# Altium PCB PCB.PcbDoc (part 1 of 8)
Units mm, origin at the board's own origin, x right, y up, seen from the top; angles counter-clockwise.
Board outline 78.8 x 69 mm, 12 copper layers (Top Layer, GND_12, uStrip1, GND_35, Clocks, GND_57, POWER, Slow_Ctrl, GND_810, uStrip2, GND_1012, Bottom Layer), stack 2.926 mm thick; 460 components, 314 nets, 1929 pads, 3409 vias.
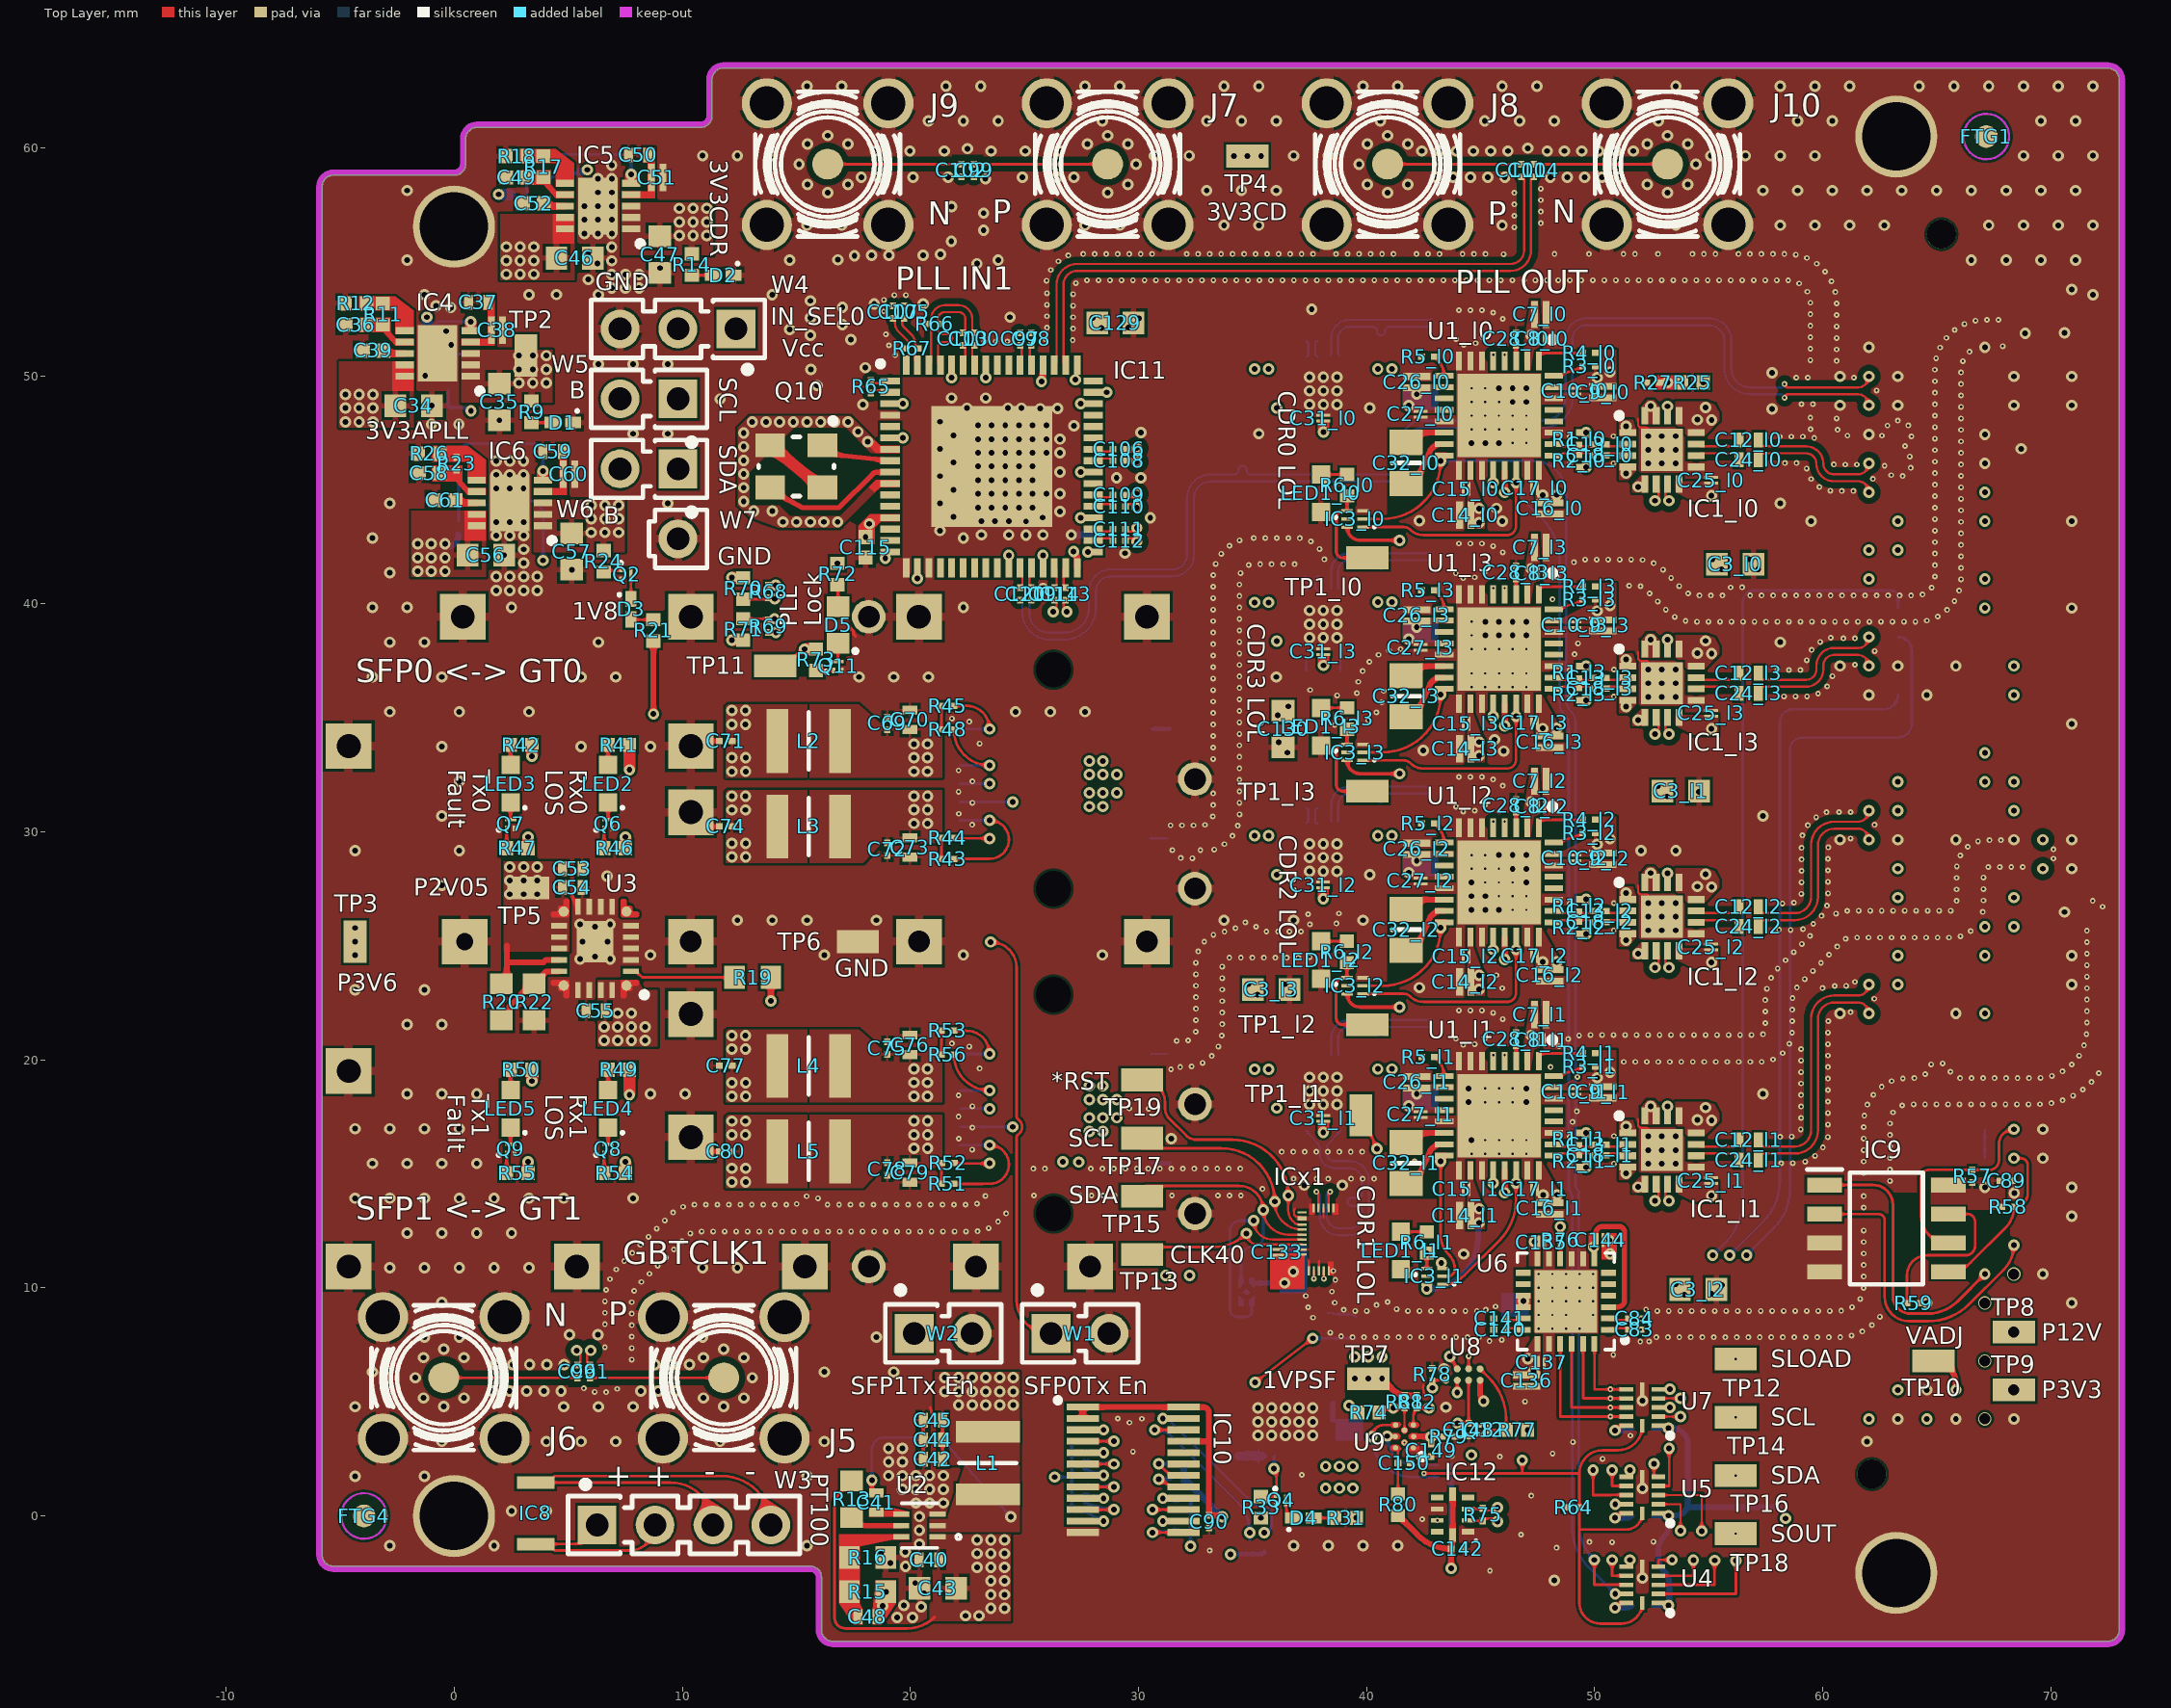
[diagram p0: Top Layer view]
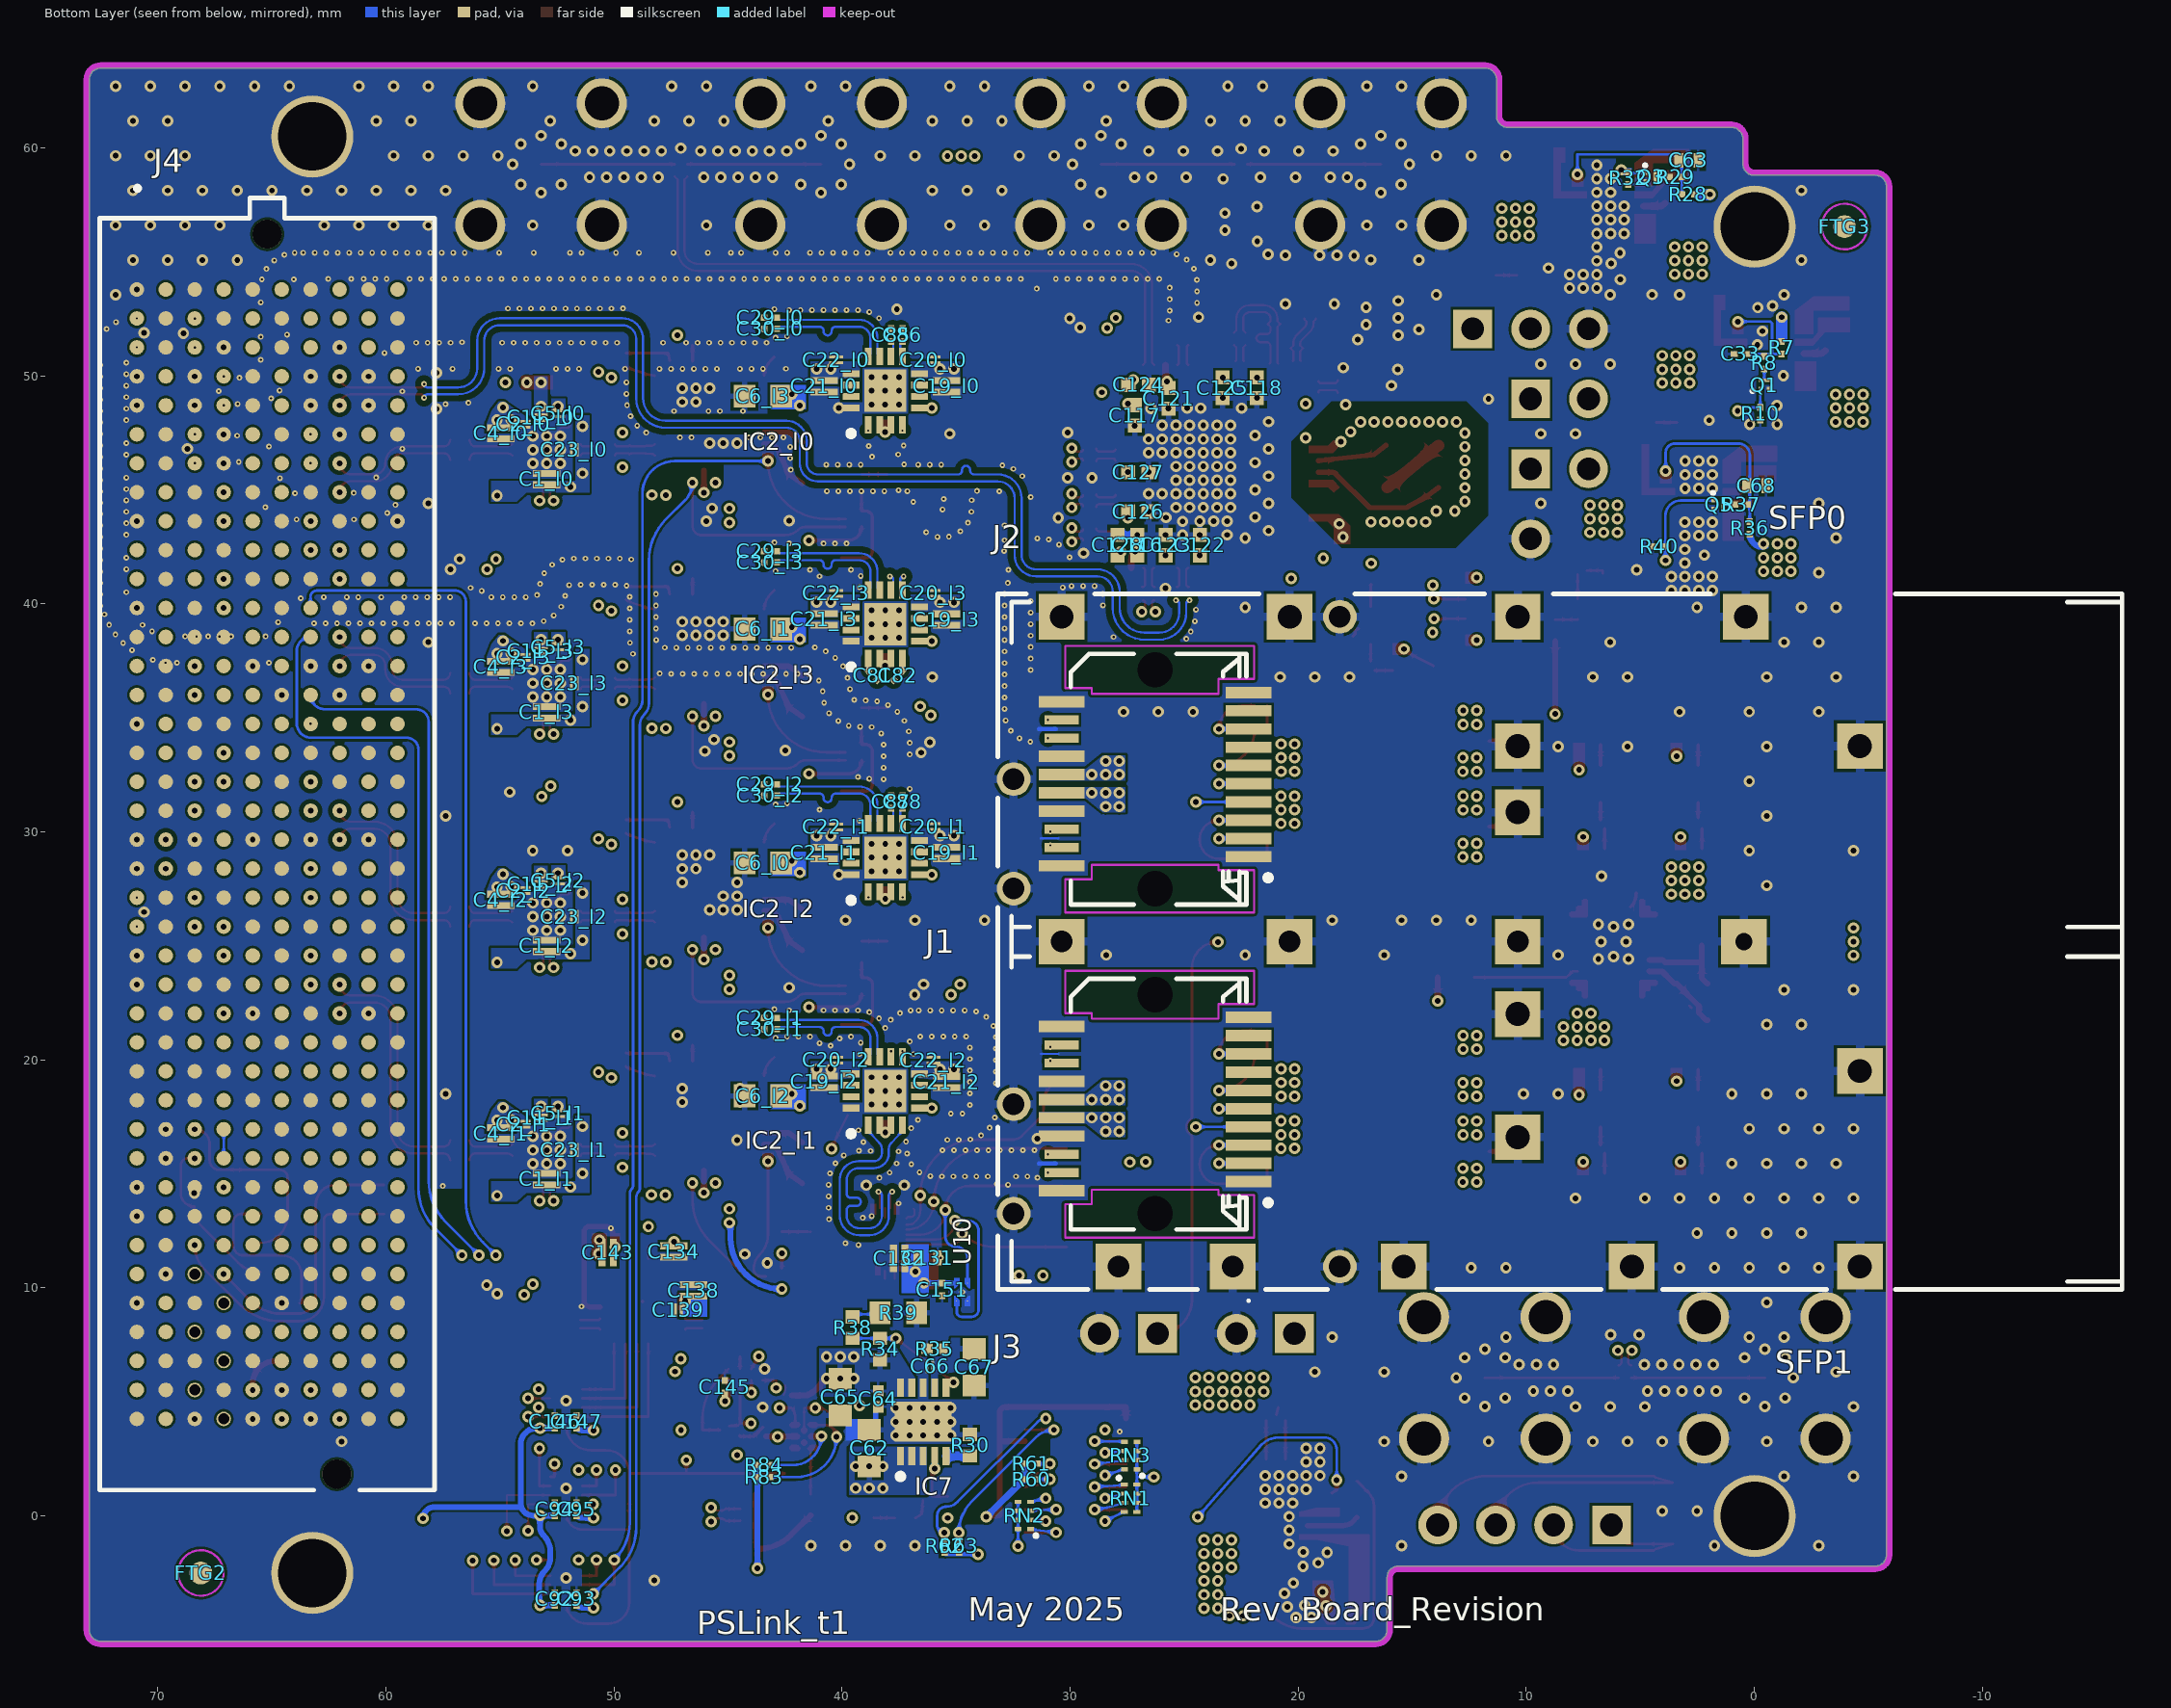
[diagram p1: Bottom Layer view, seen from below]
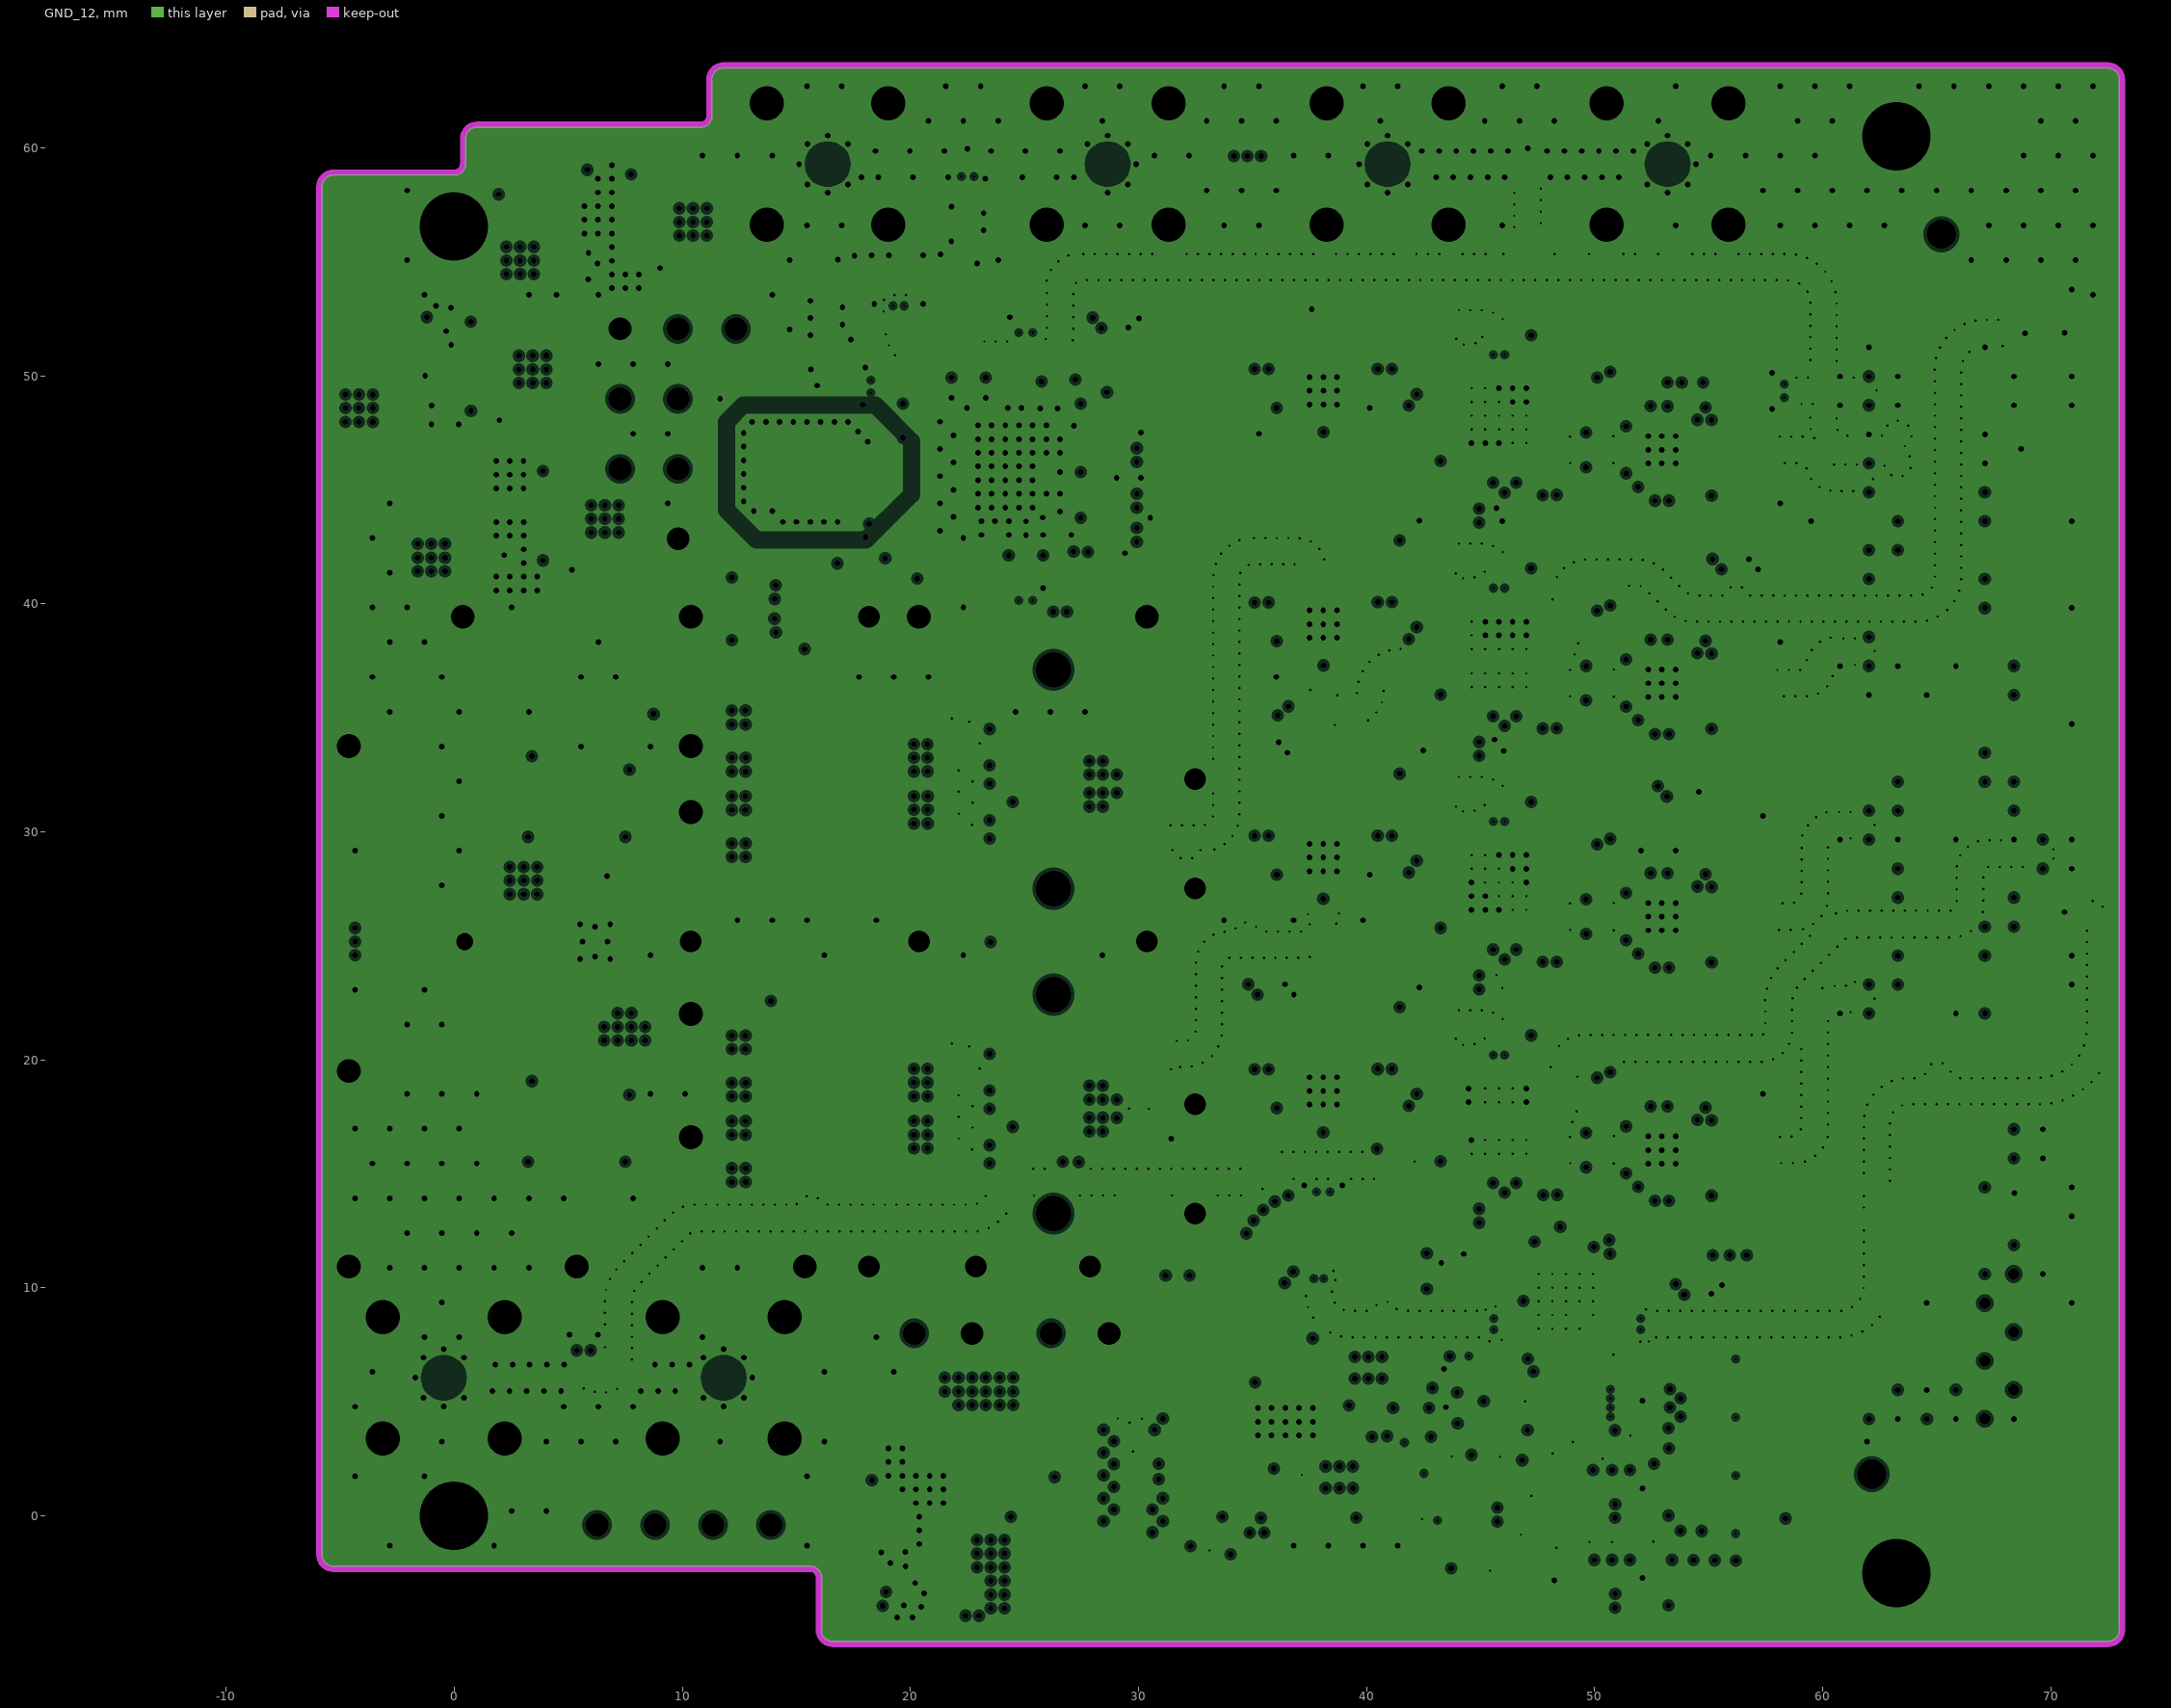
[diagram p2: GND_12, clearances drawn from the general rule]
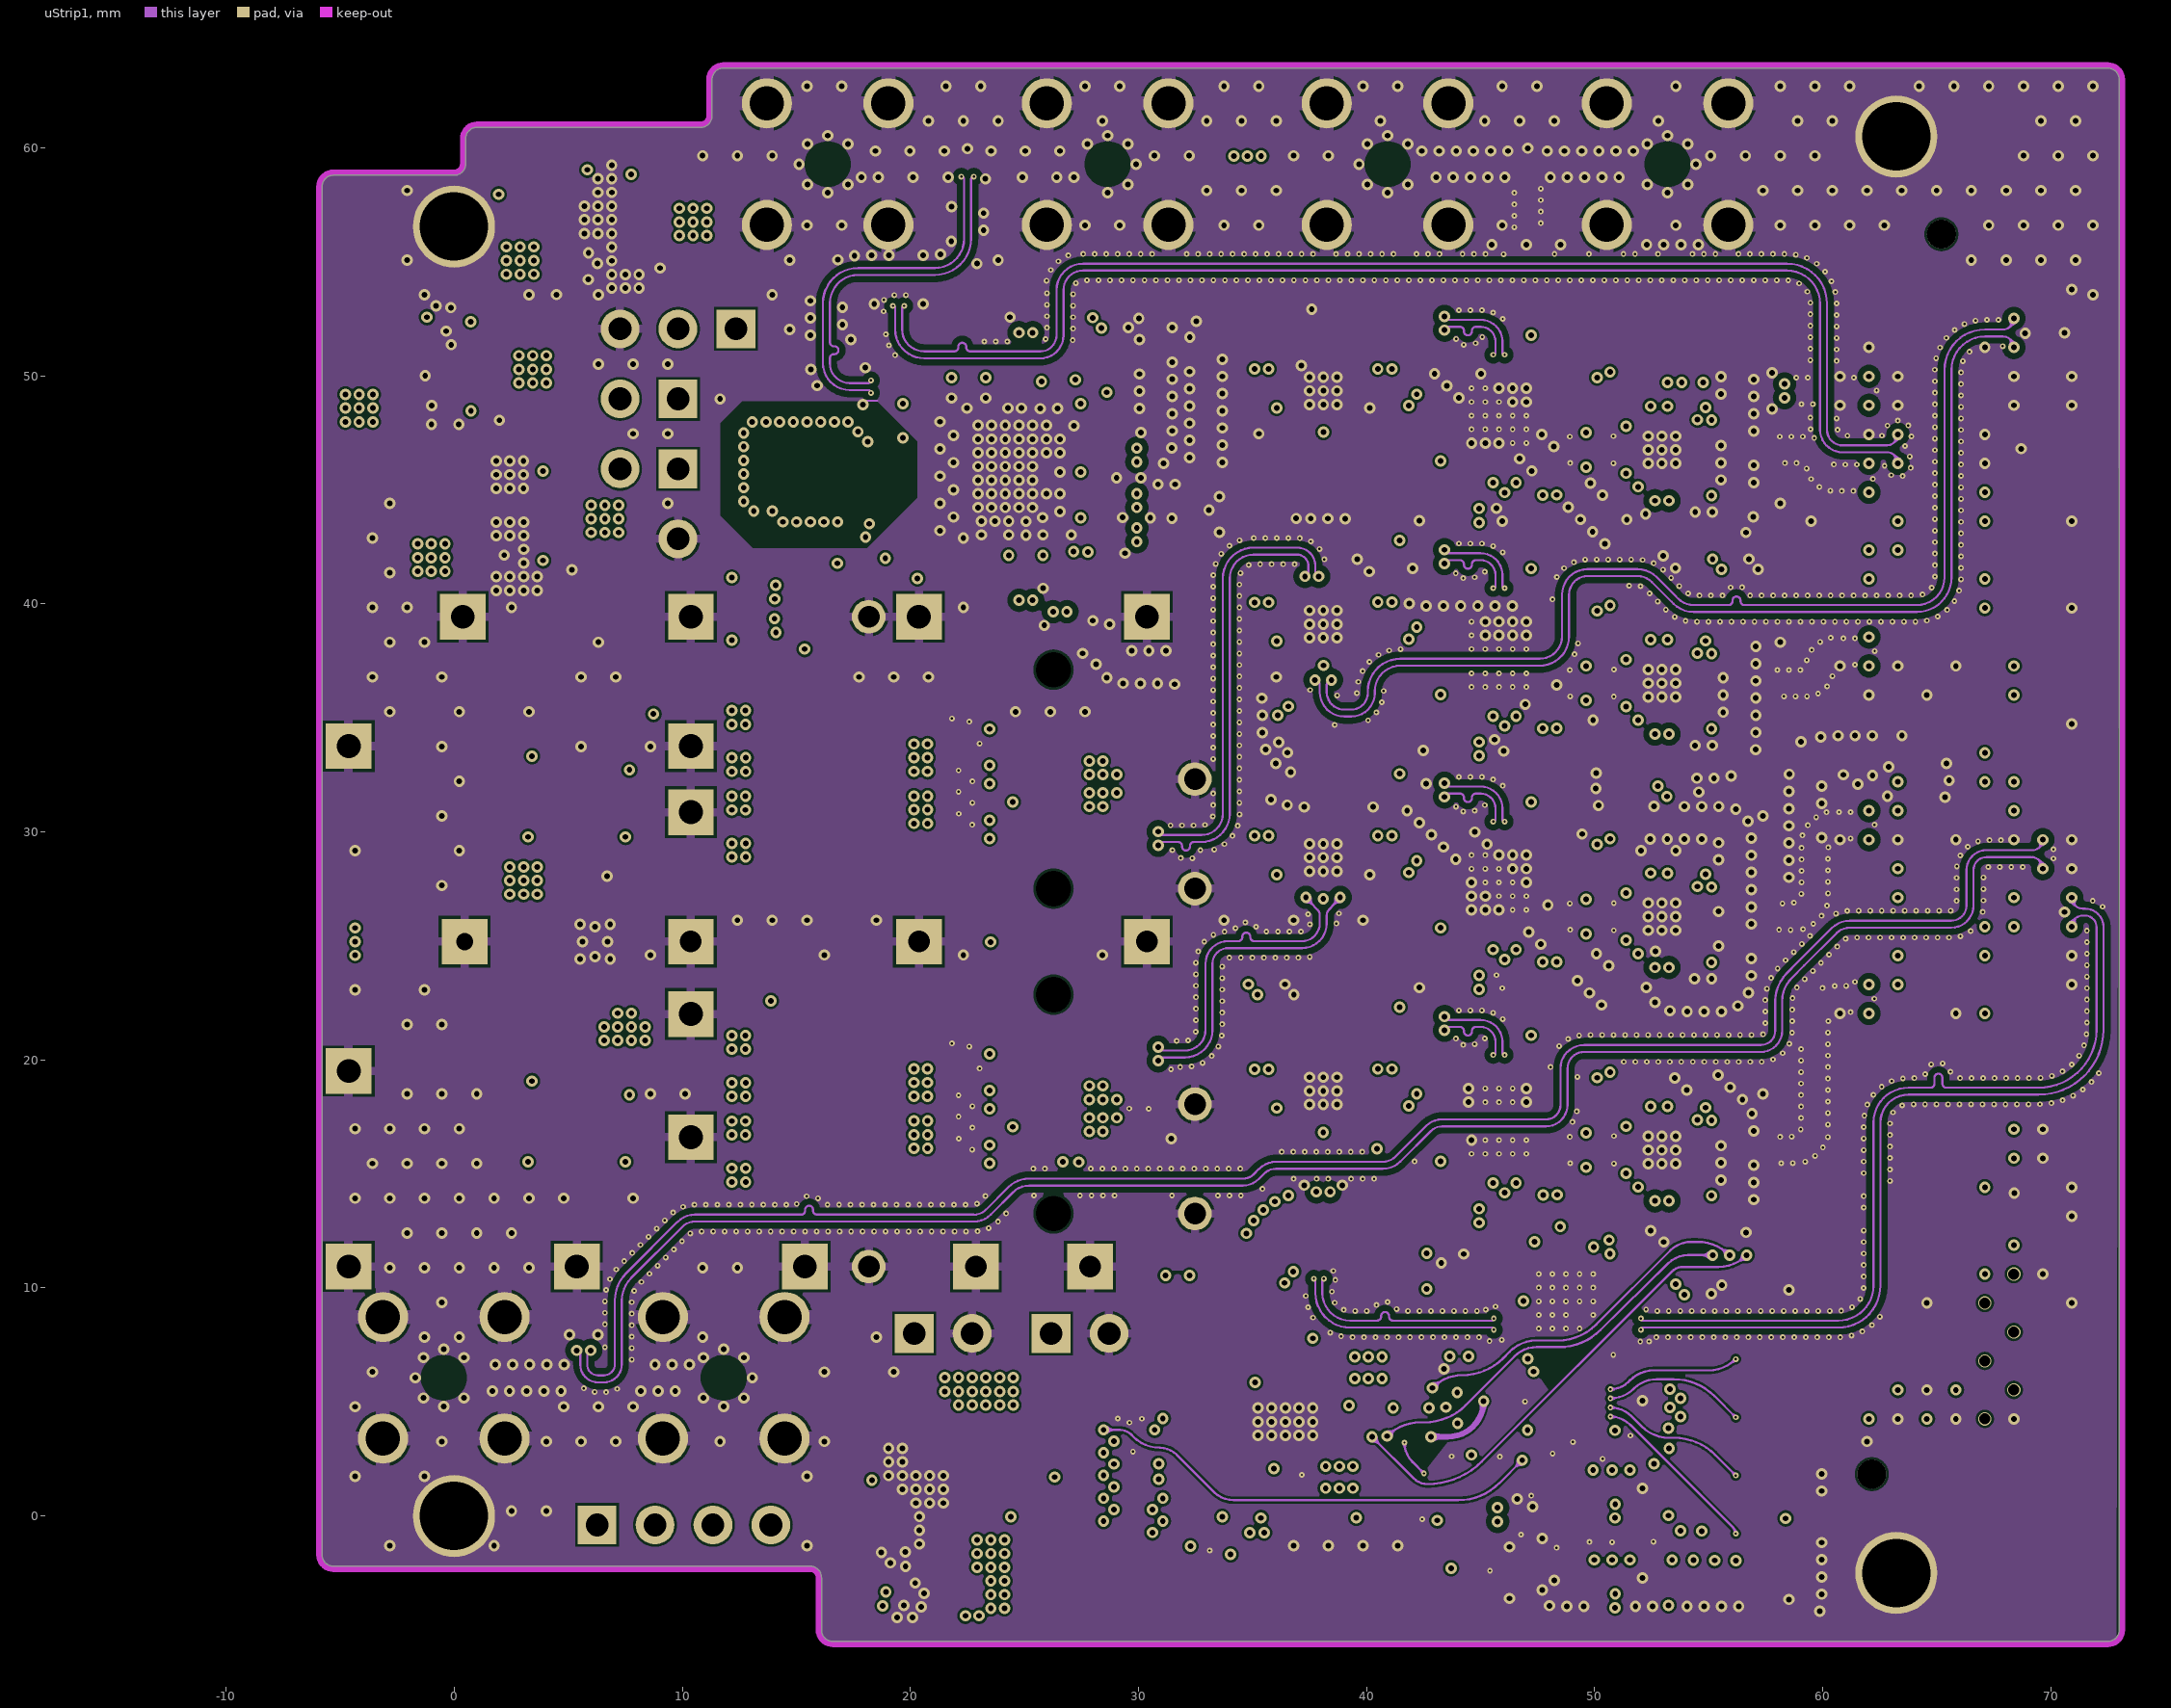
[diagram p3: uStrip1]
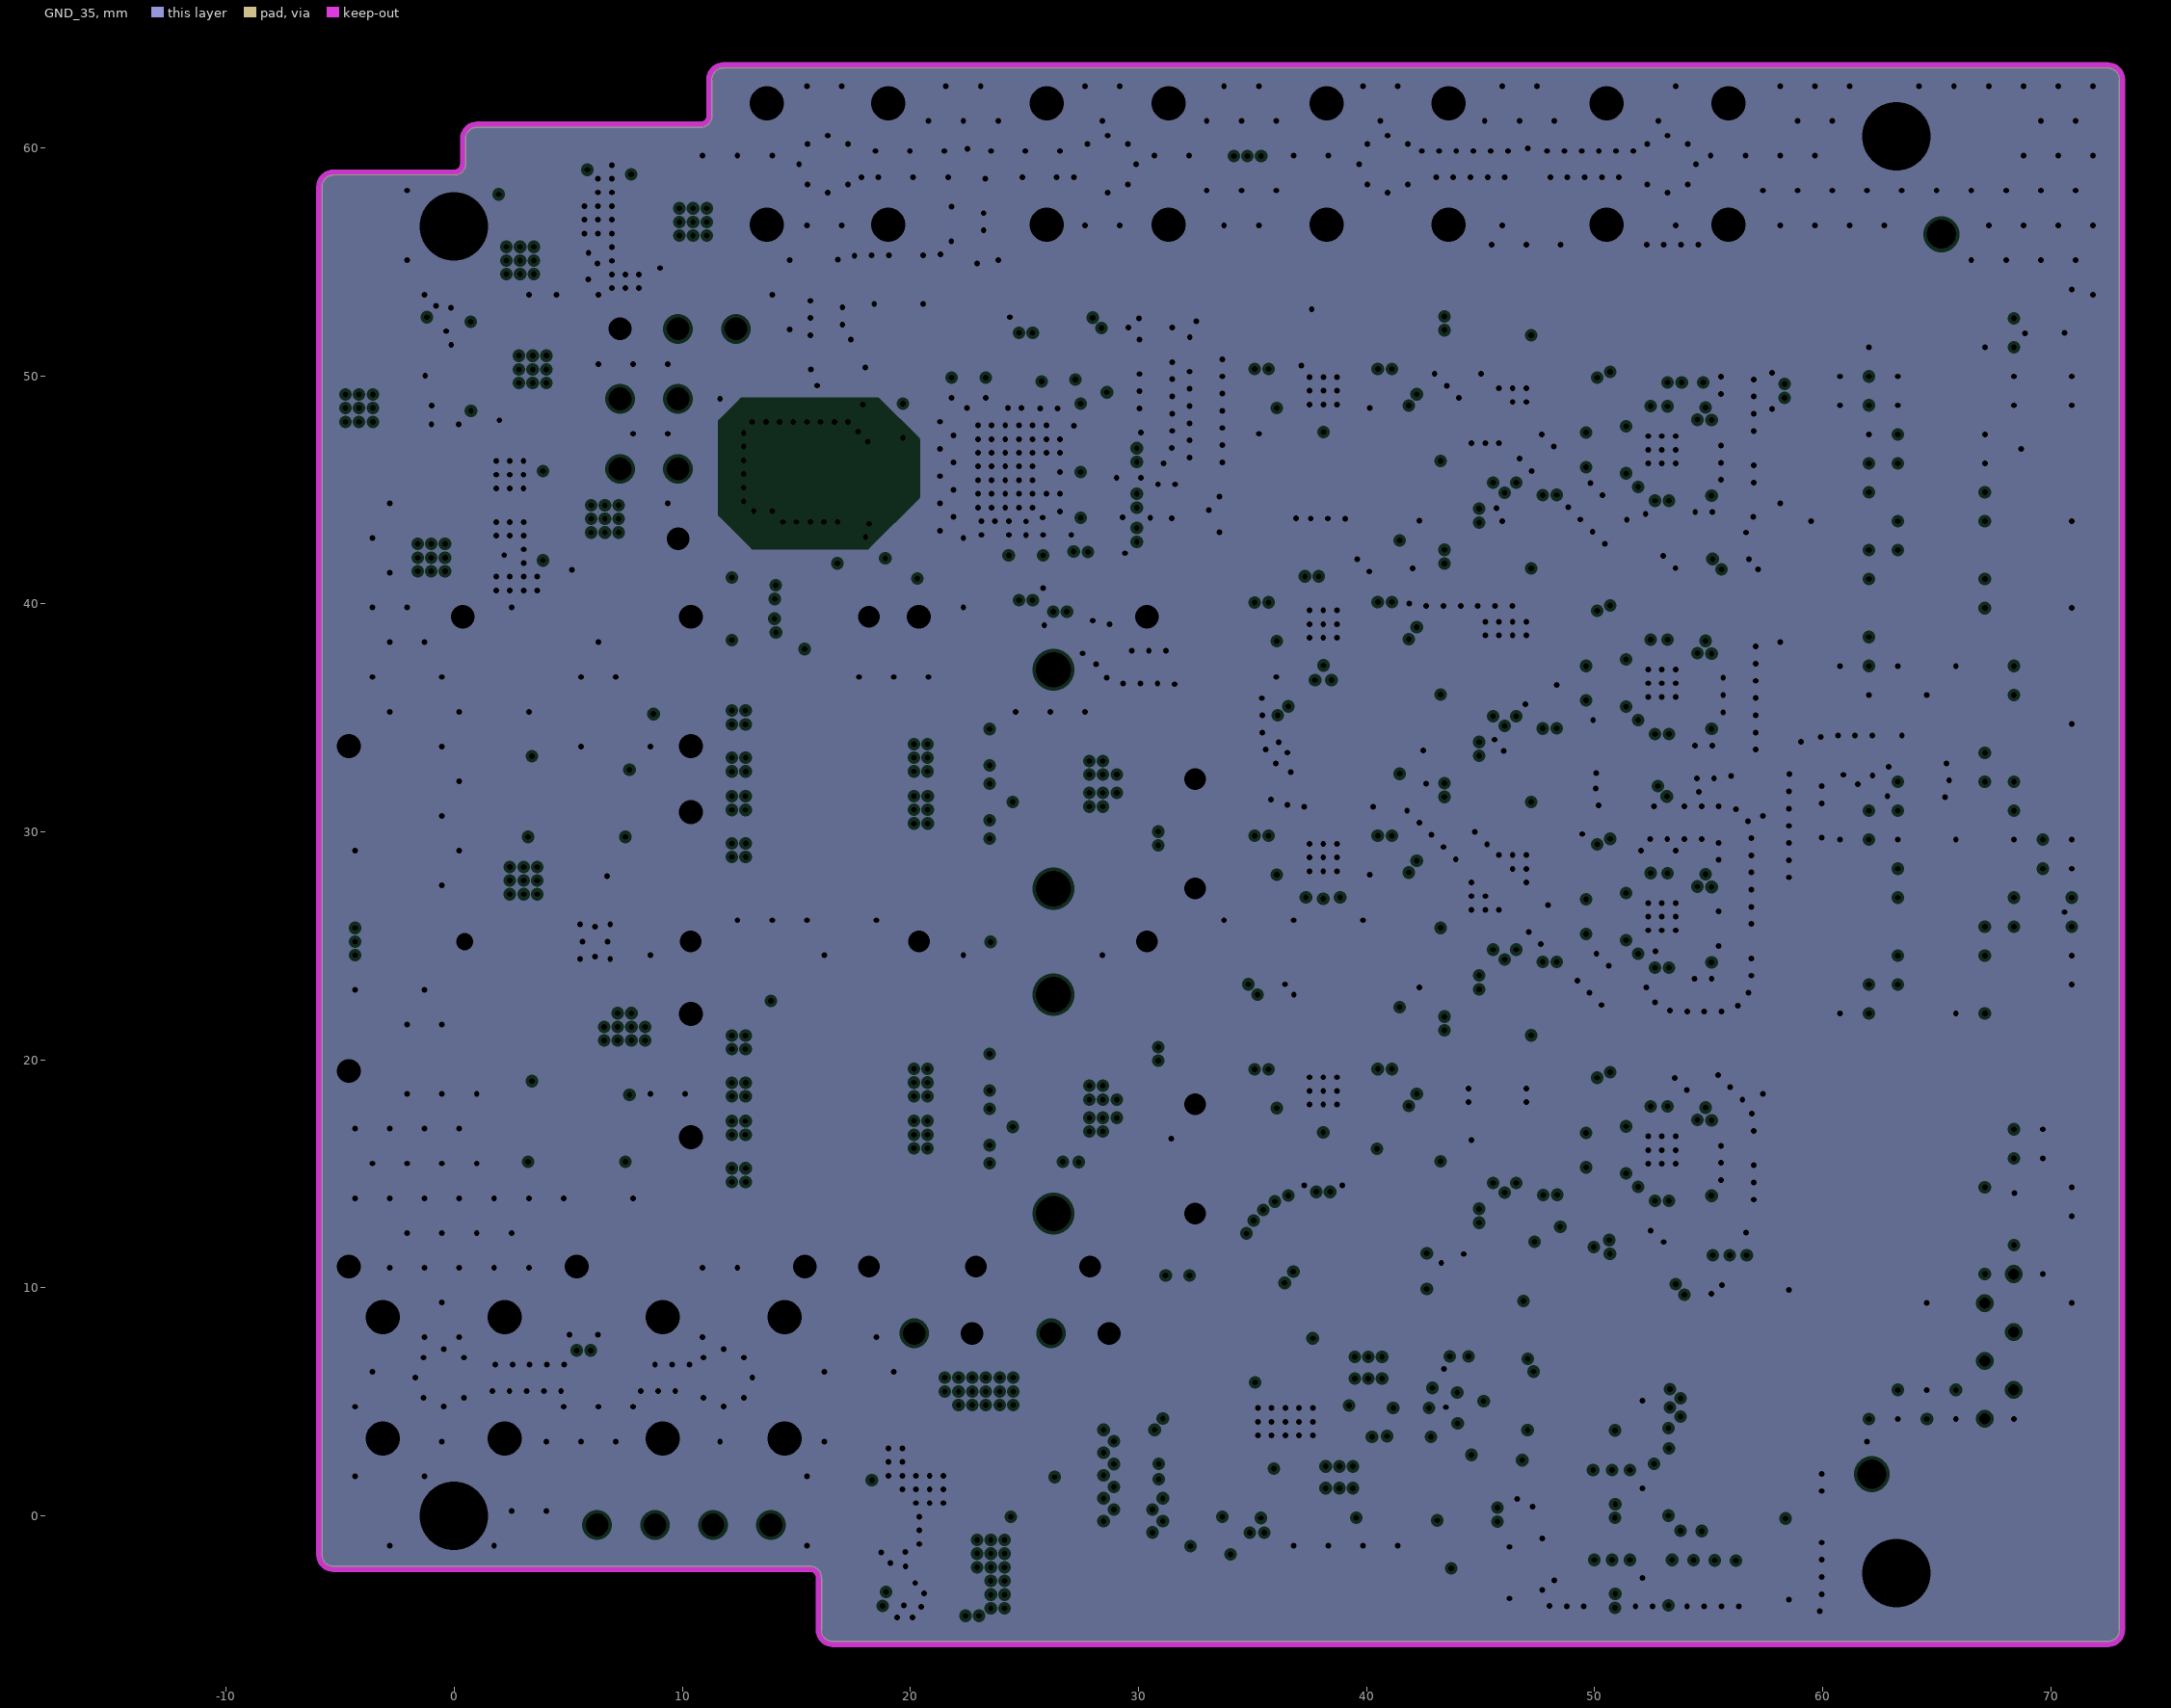
[diagram p4: GND_35, clearances drawn from the general rule]
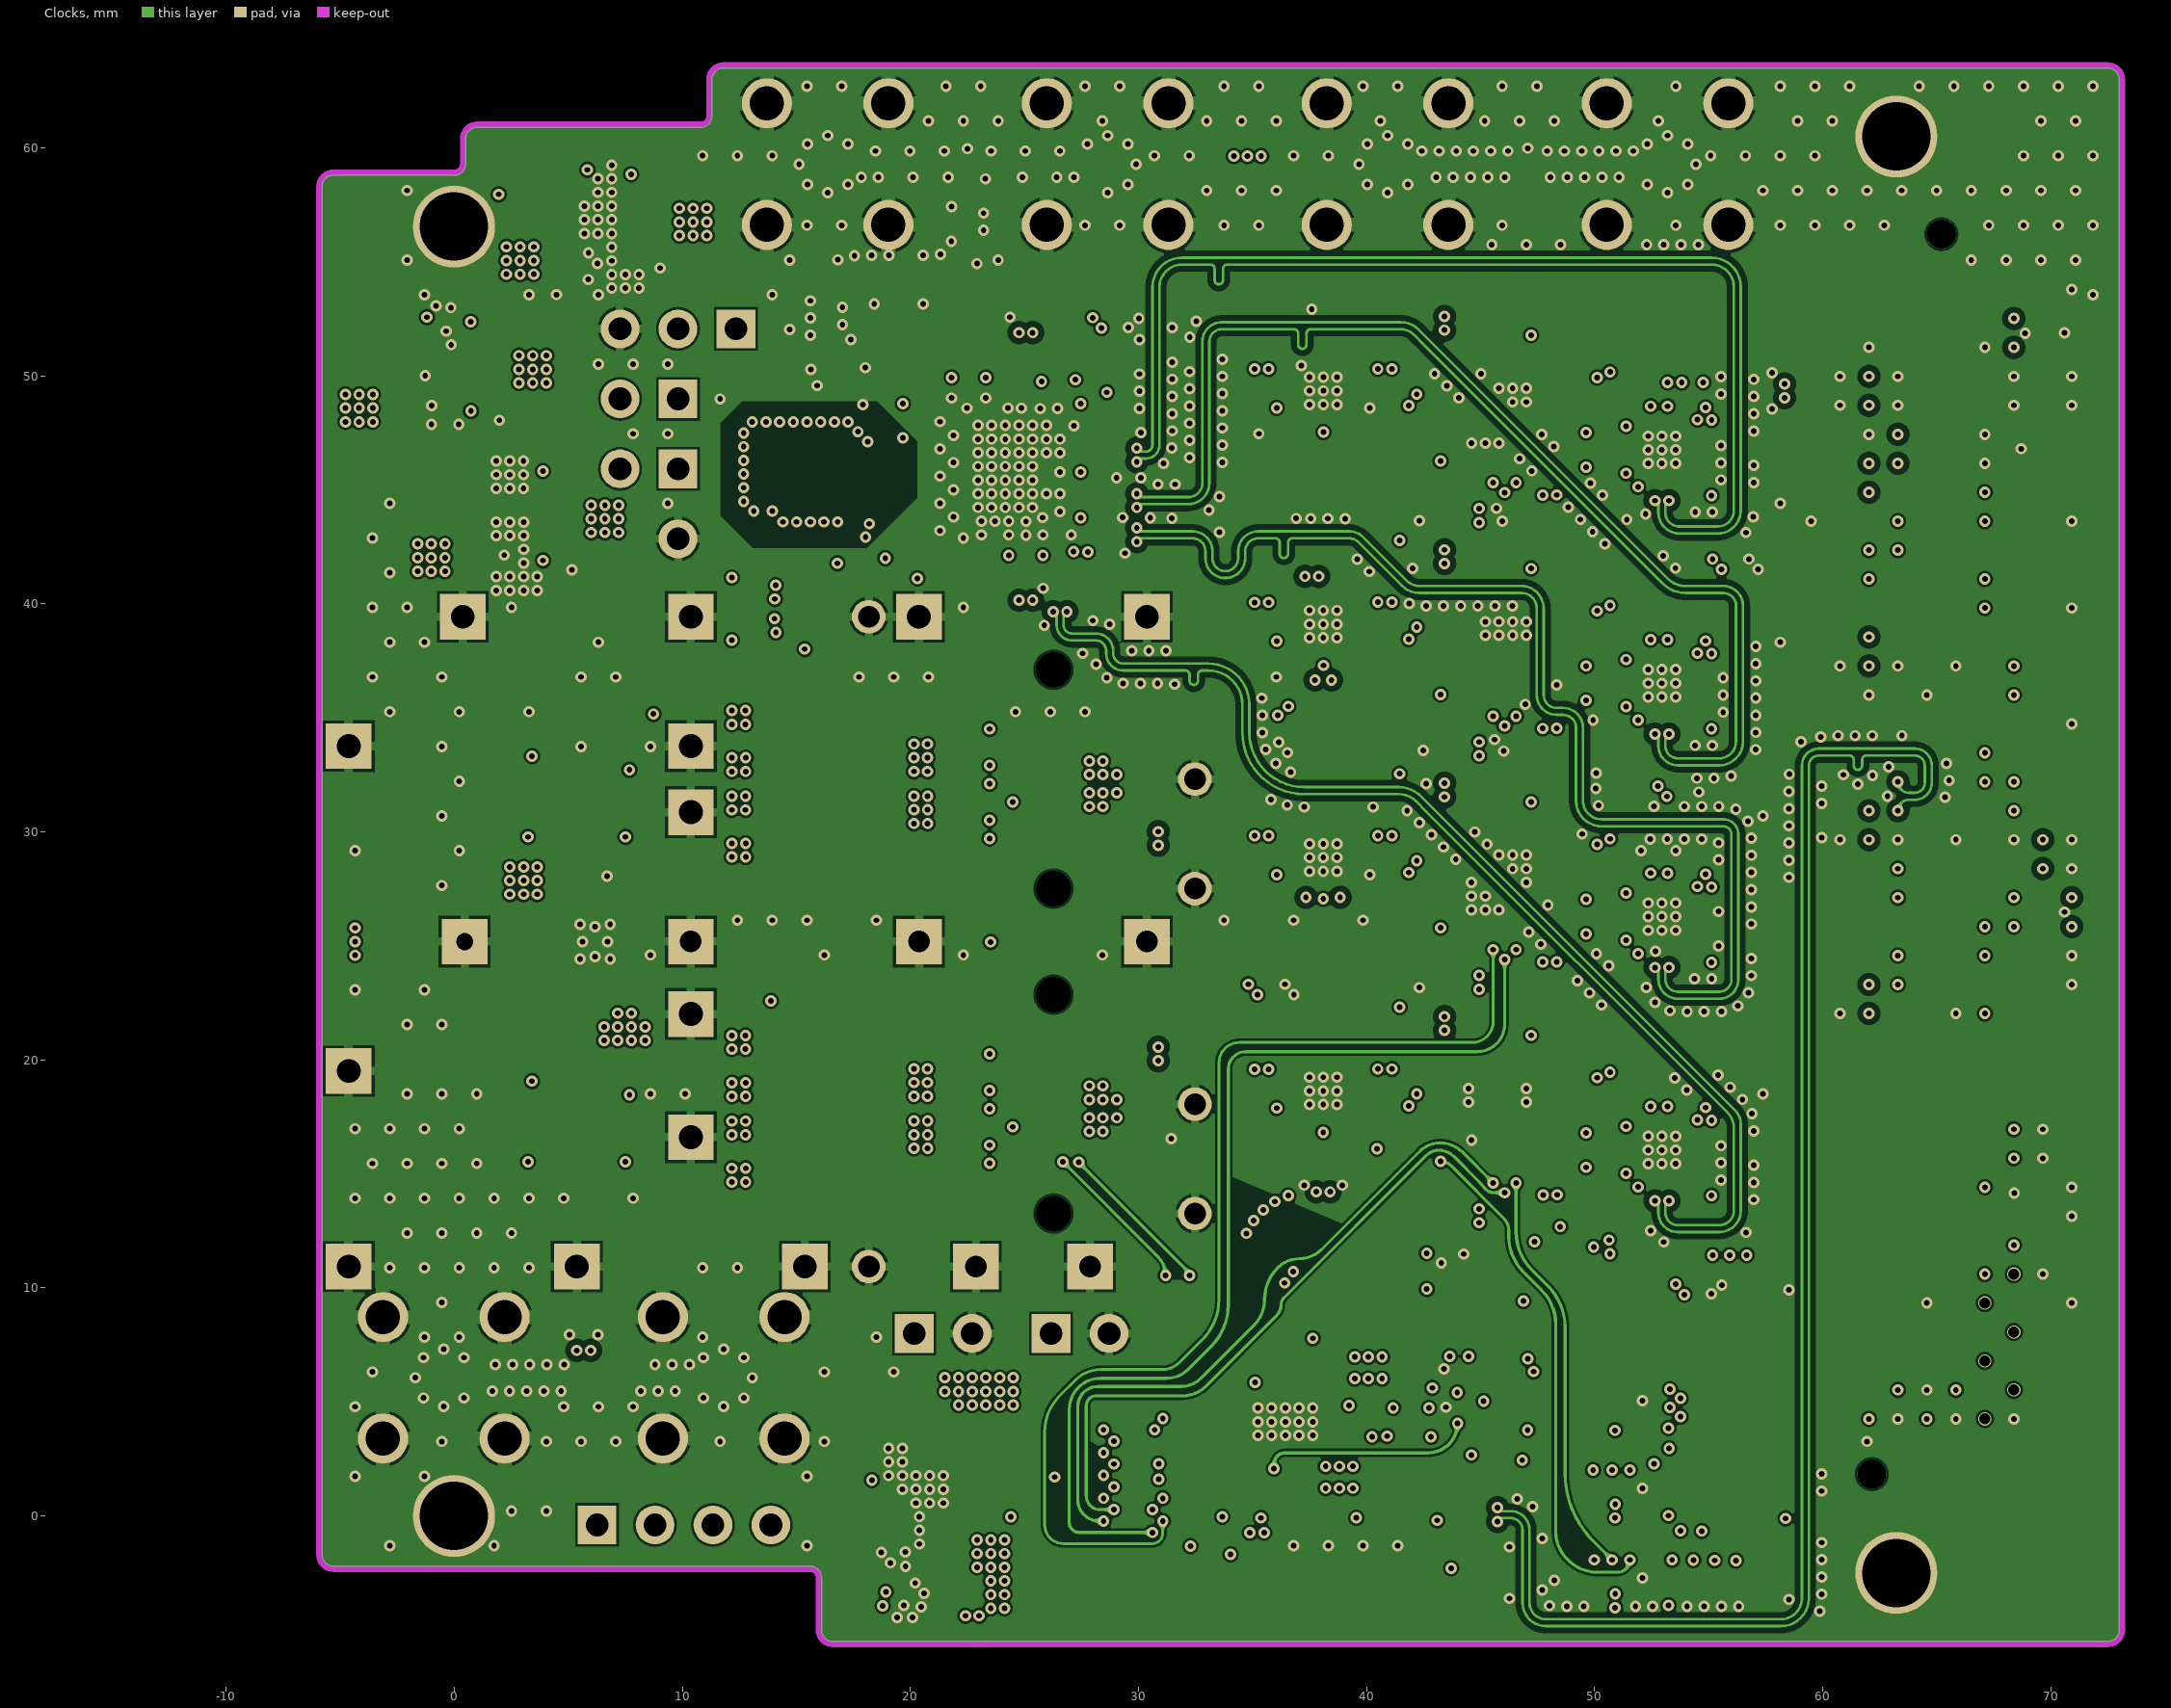
[diagram p5: Clocks]
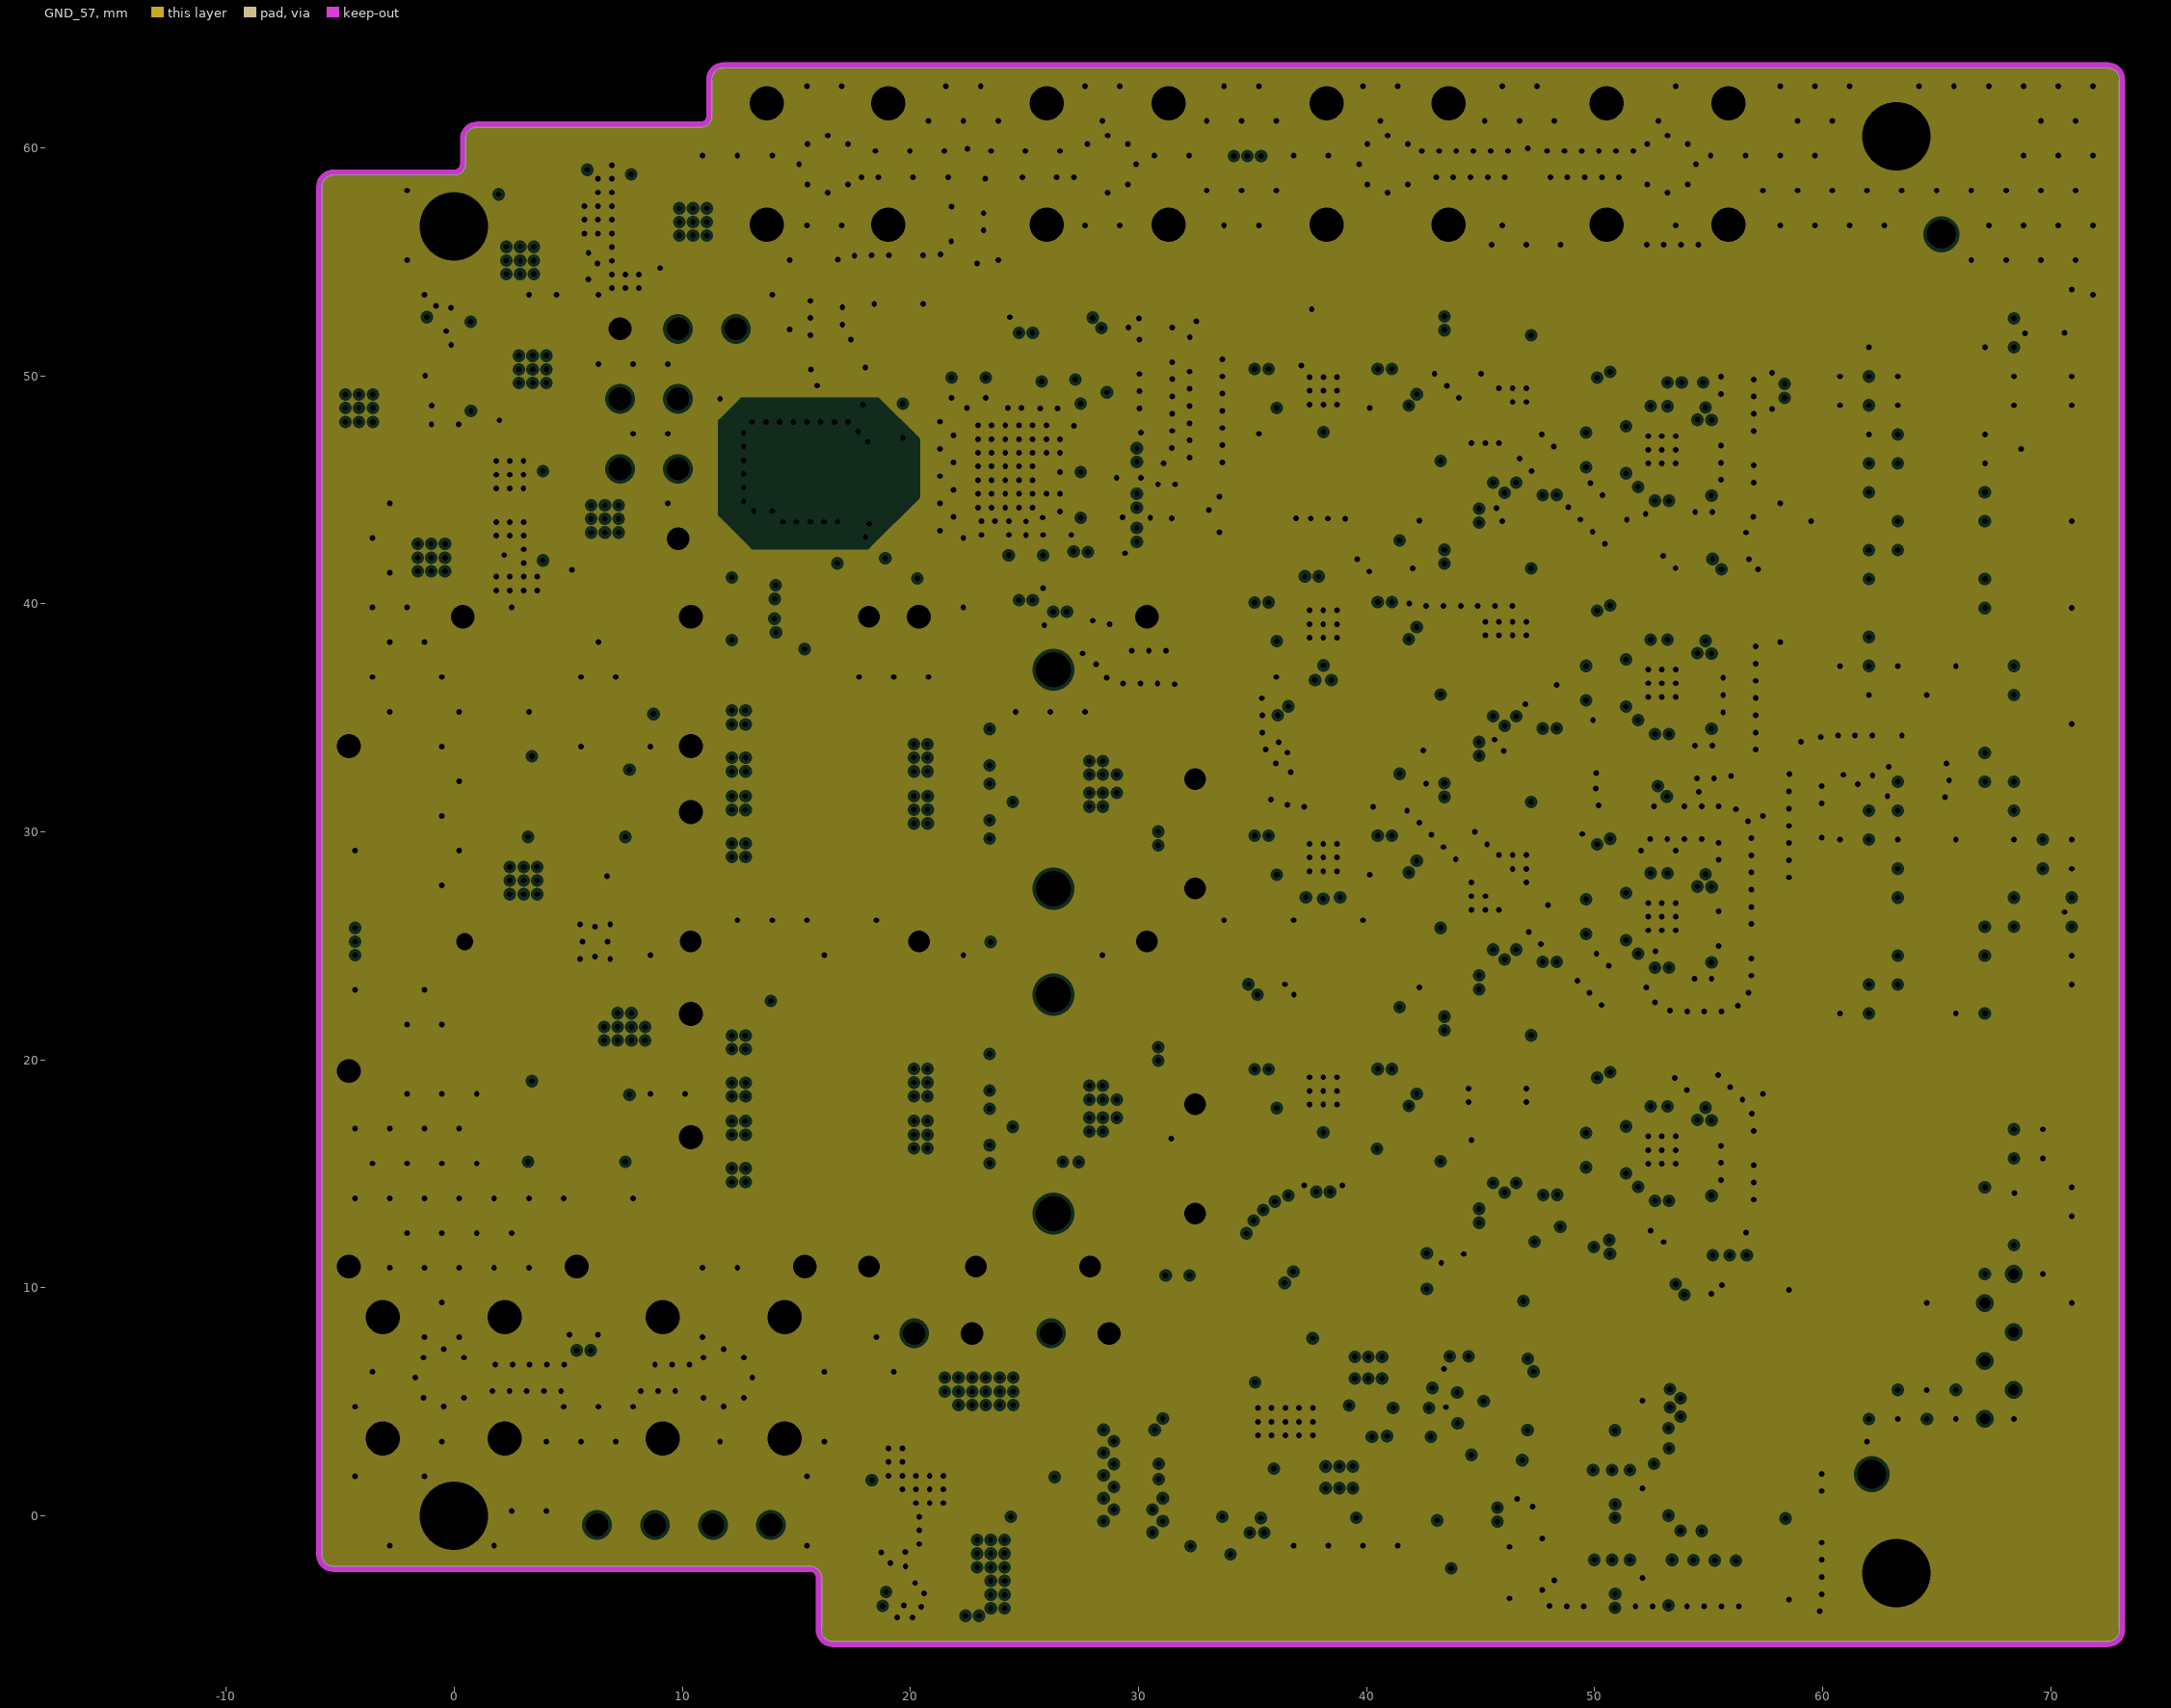
[diagram p6: GND_57, clearances drawn from the general rule]
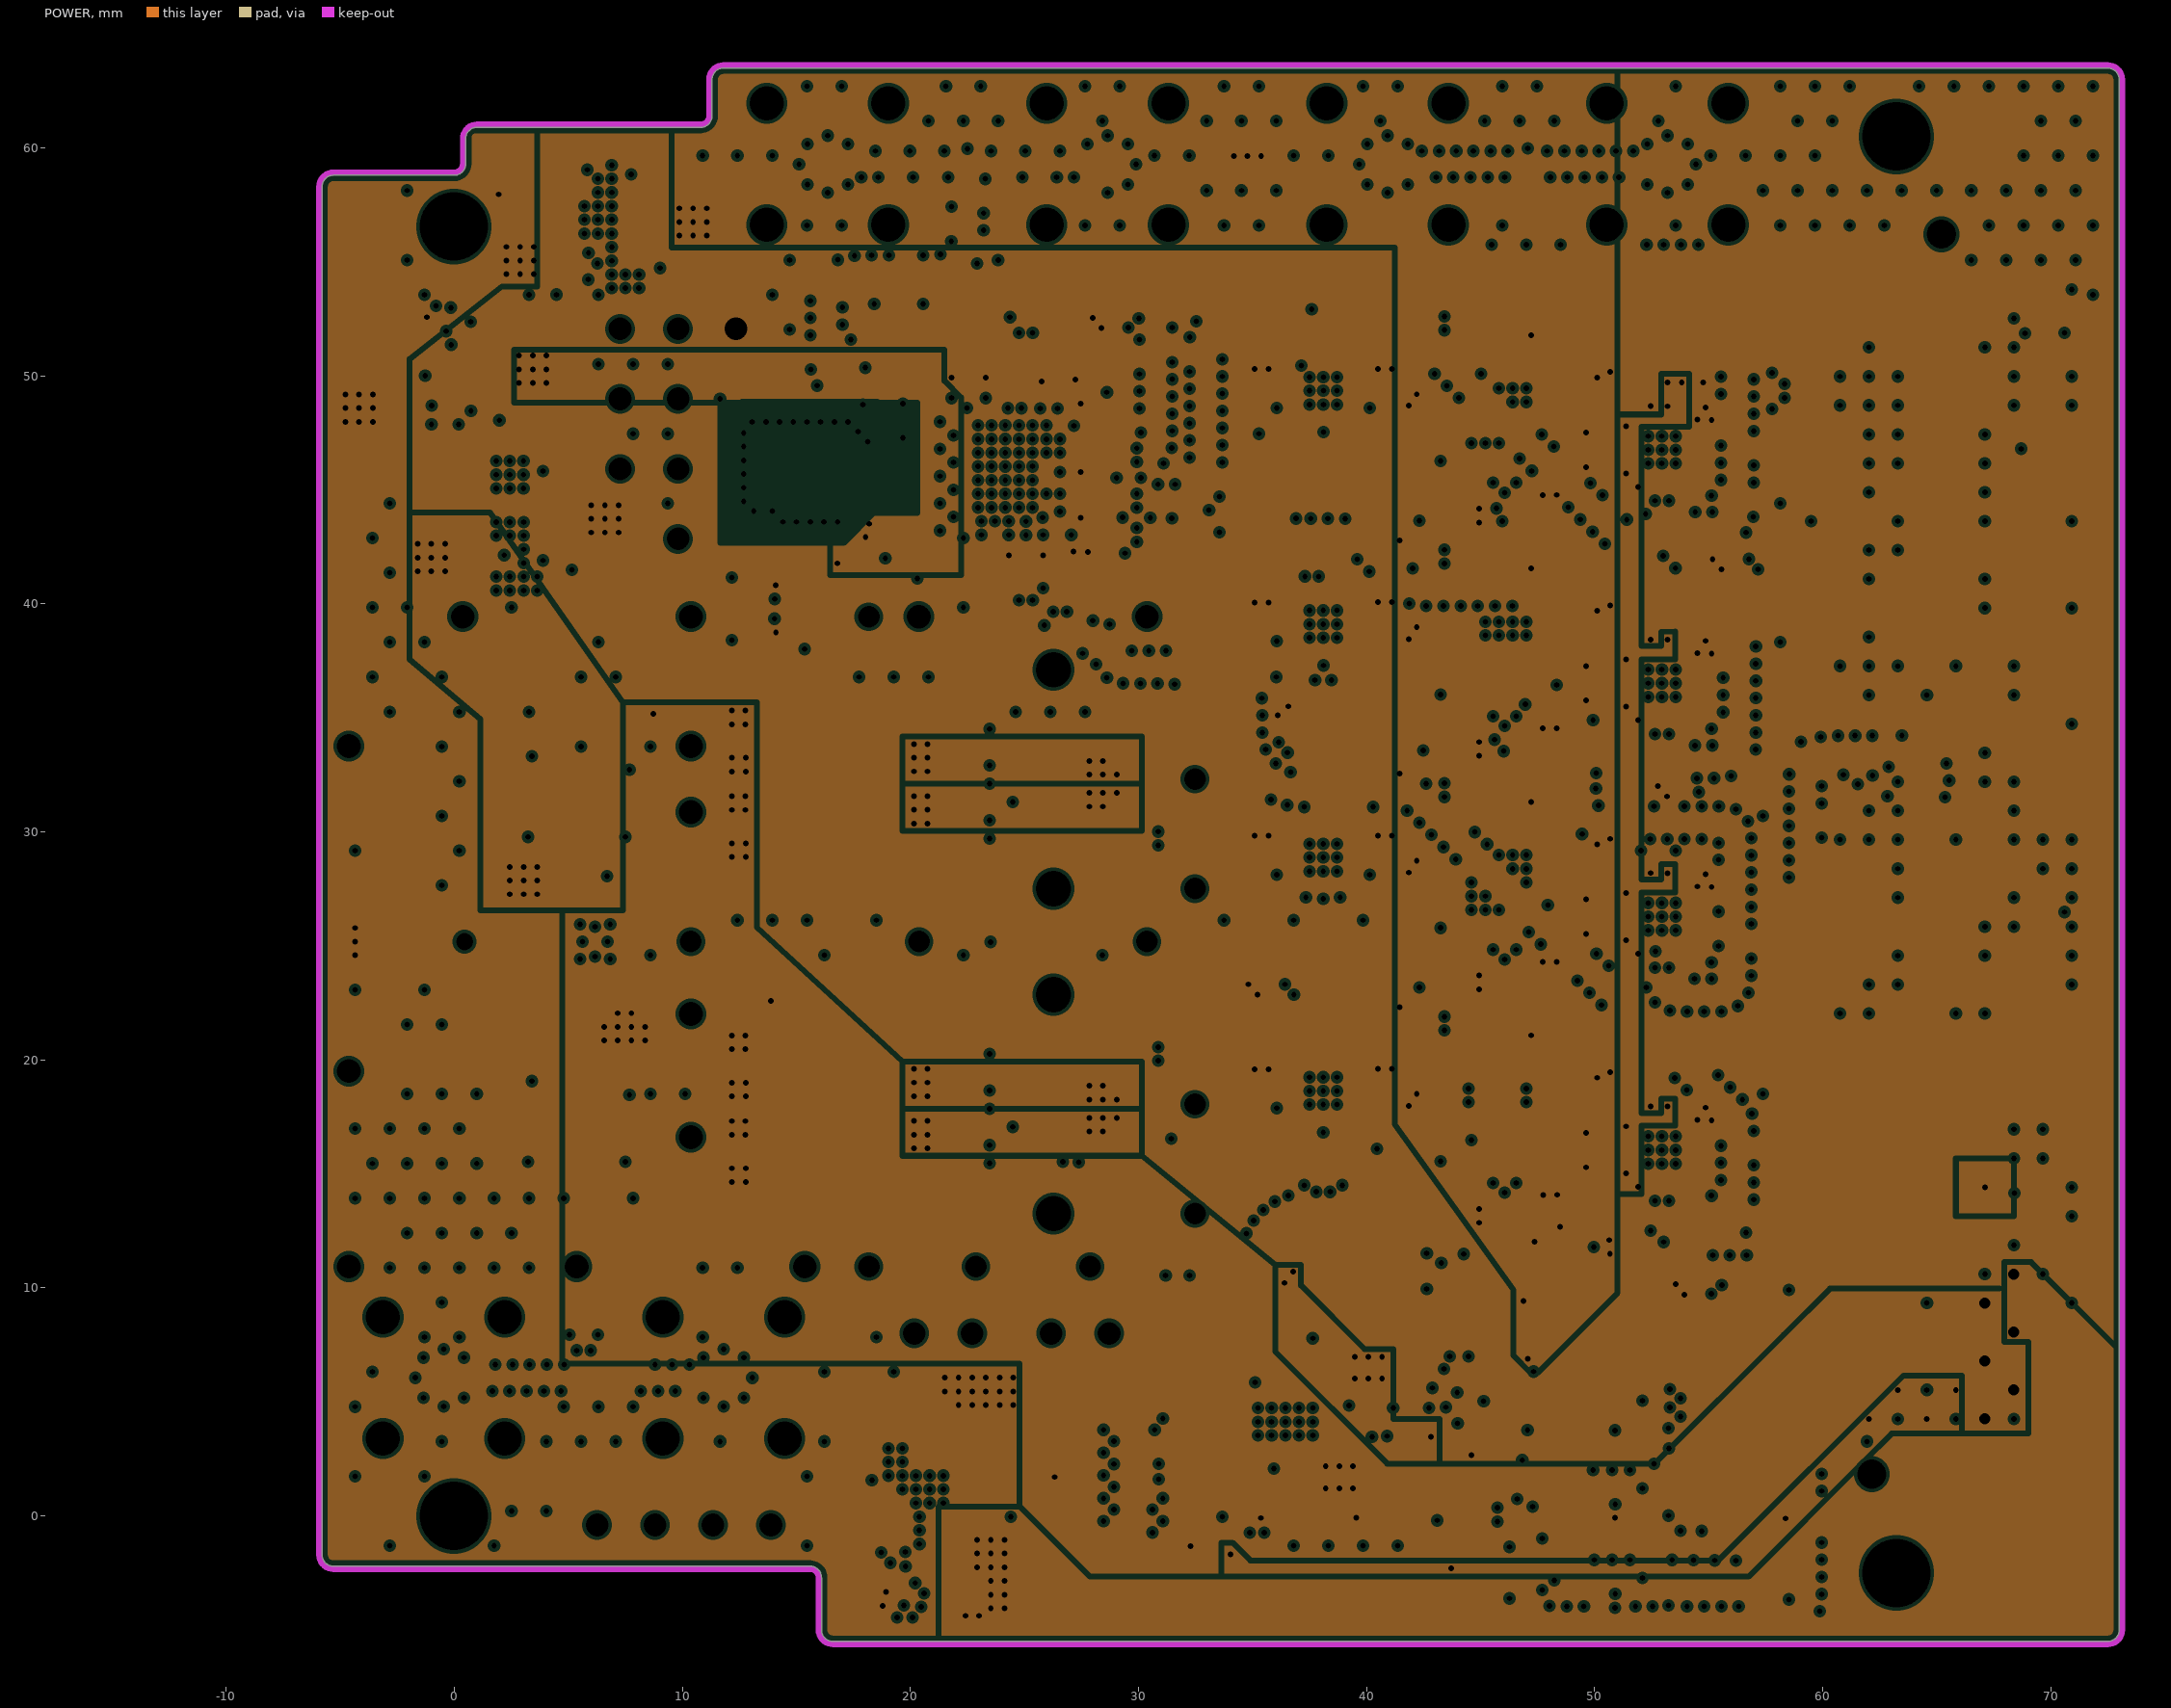
[diagram p7: POWER, clearances drawn from the general rule]
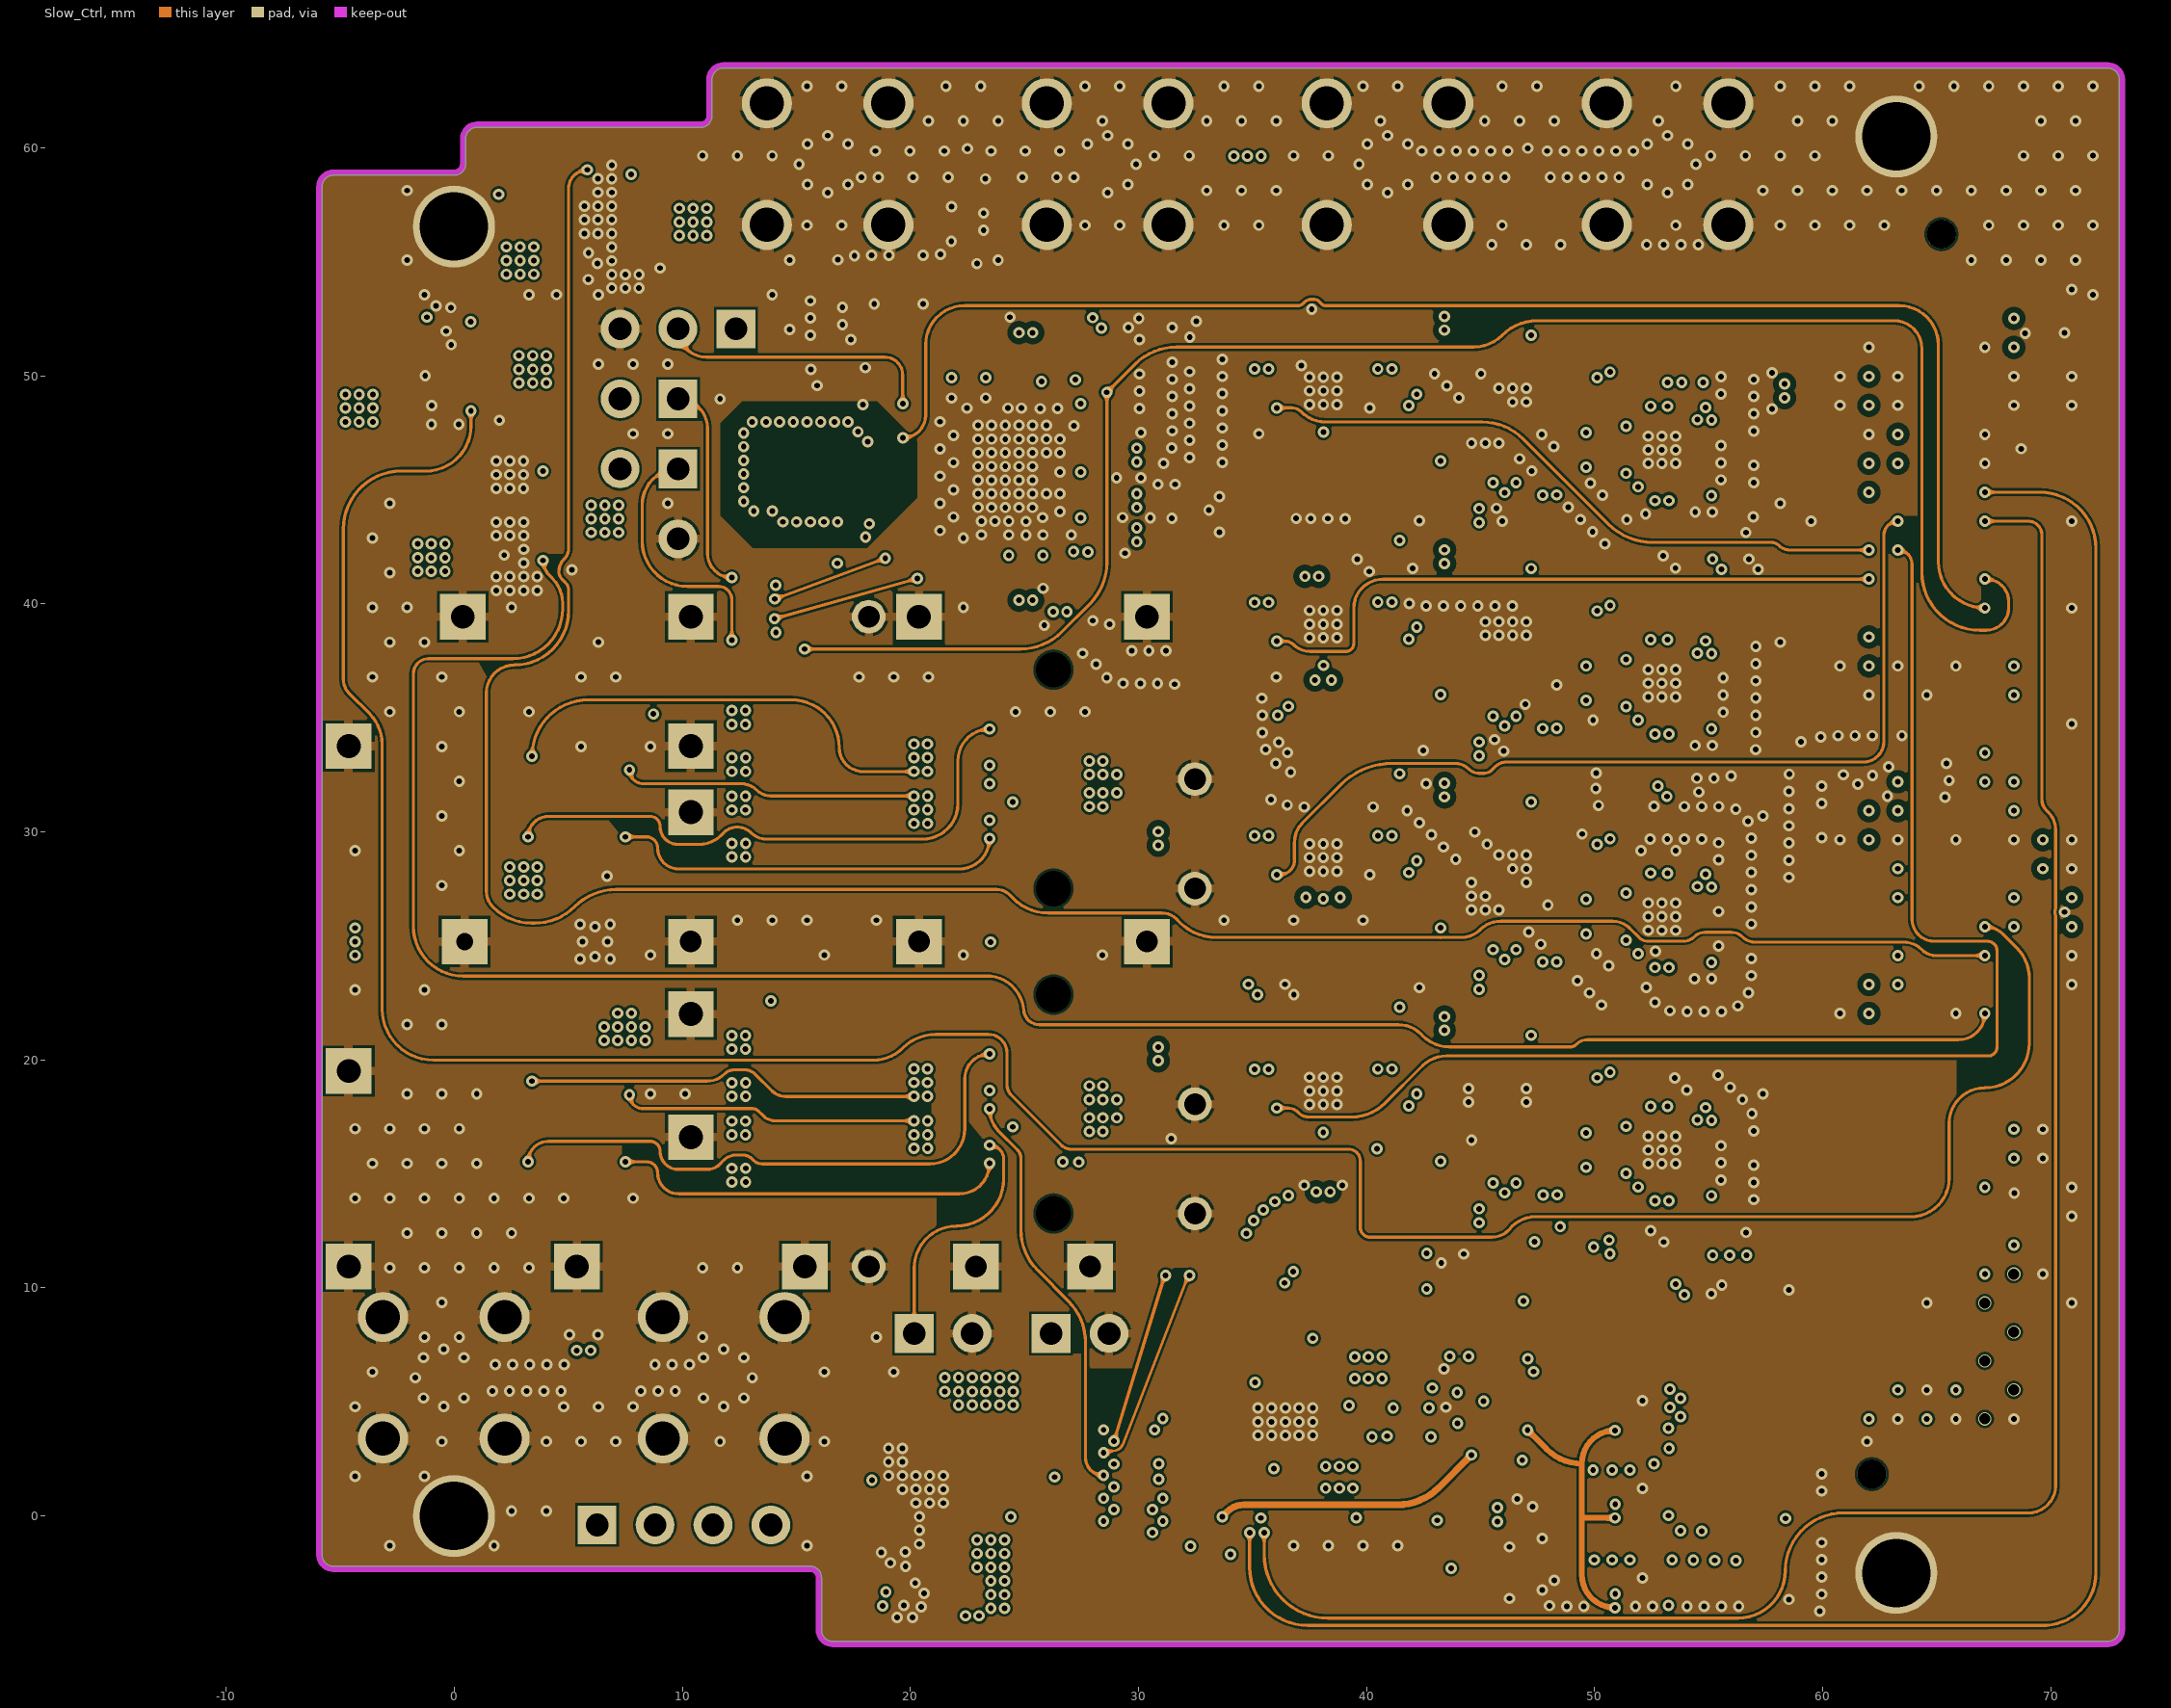
[diagram p8: Slow_Ctrl]
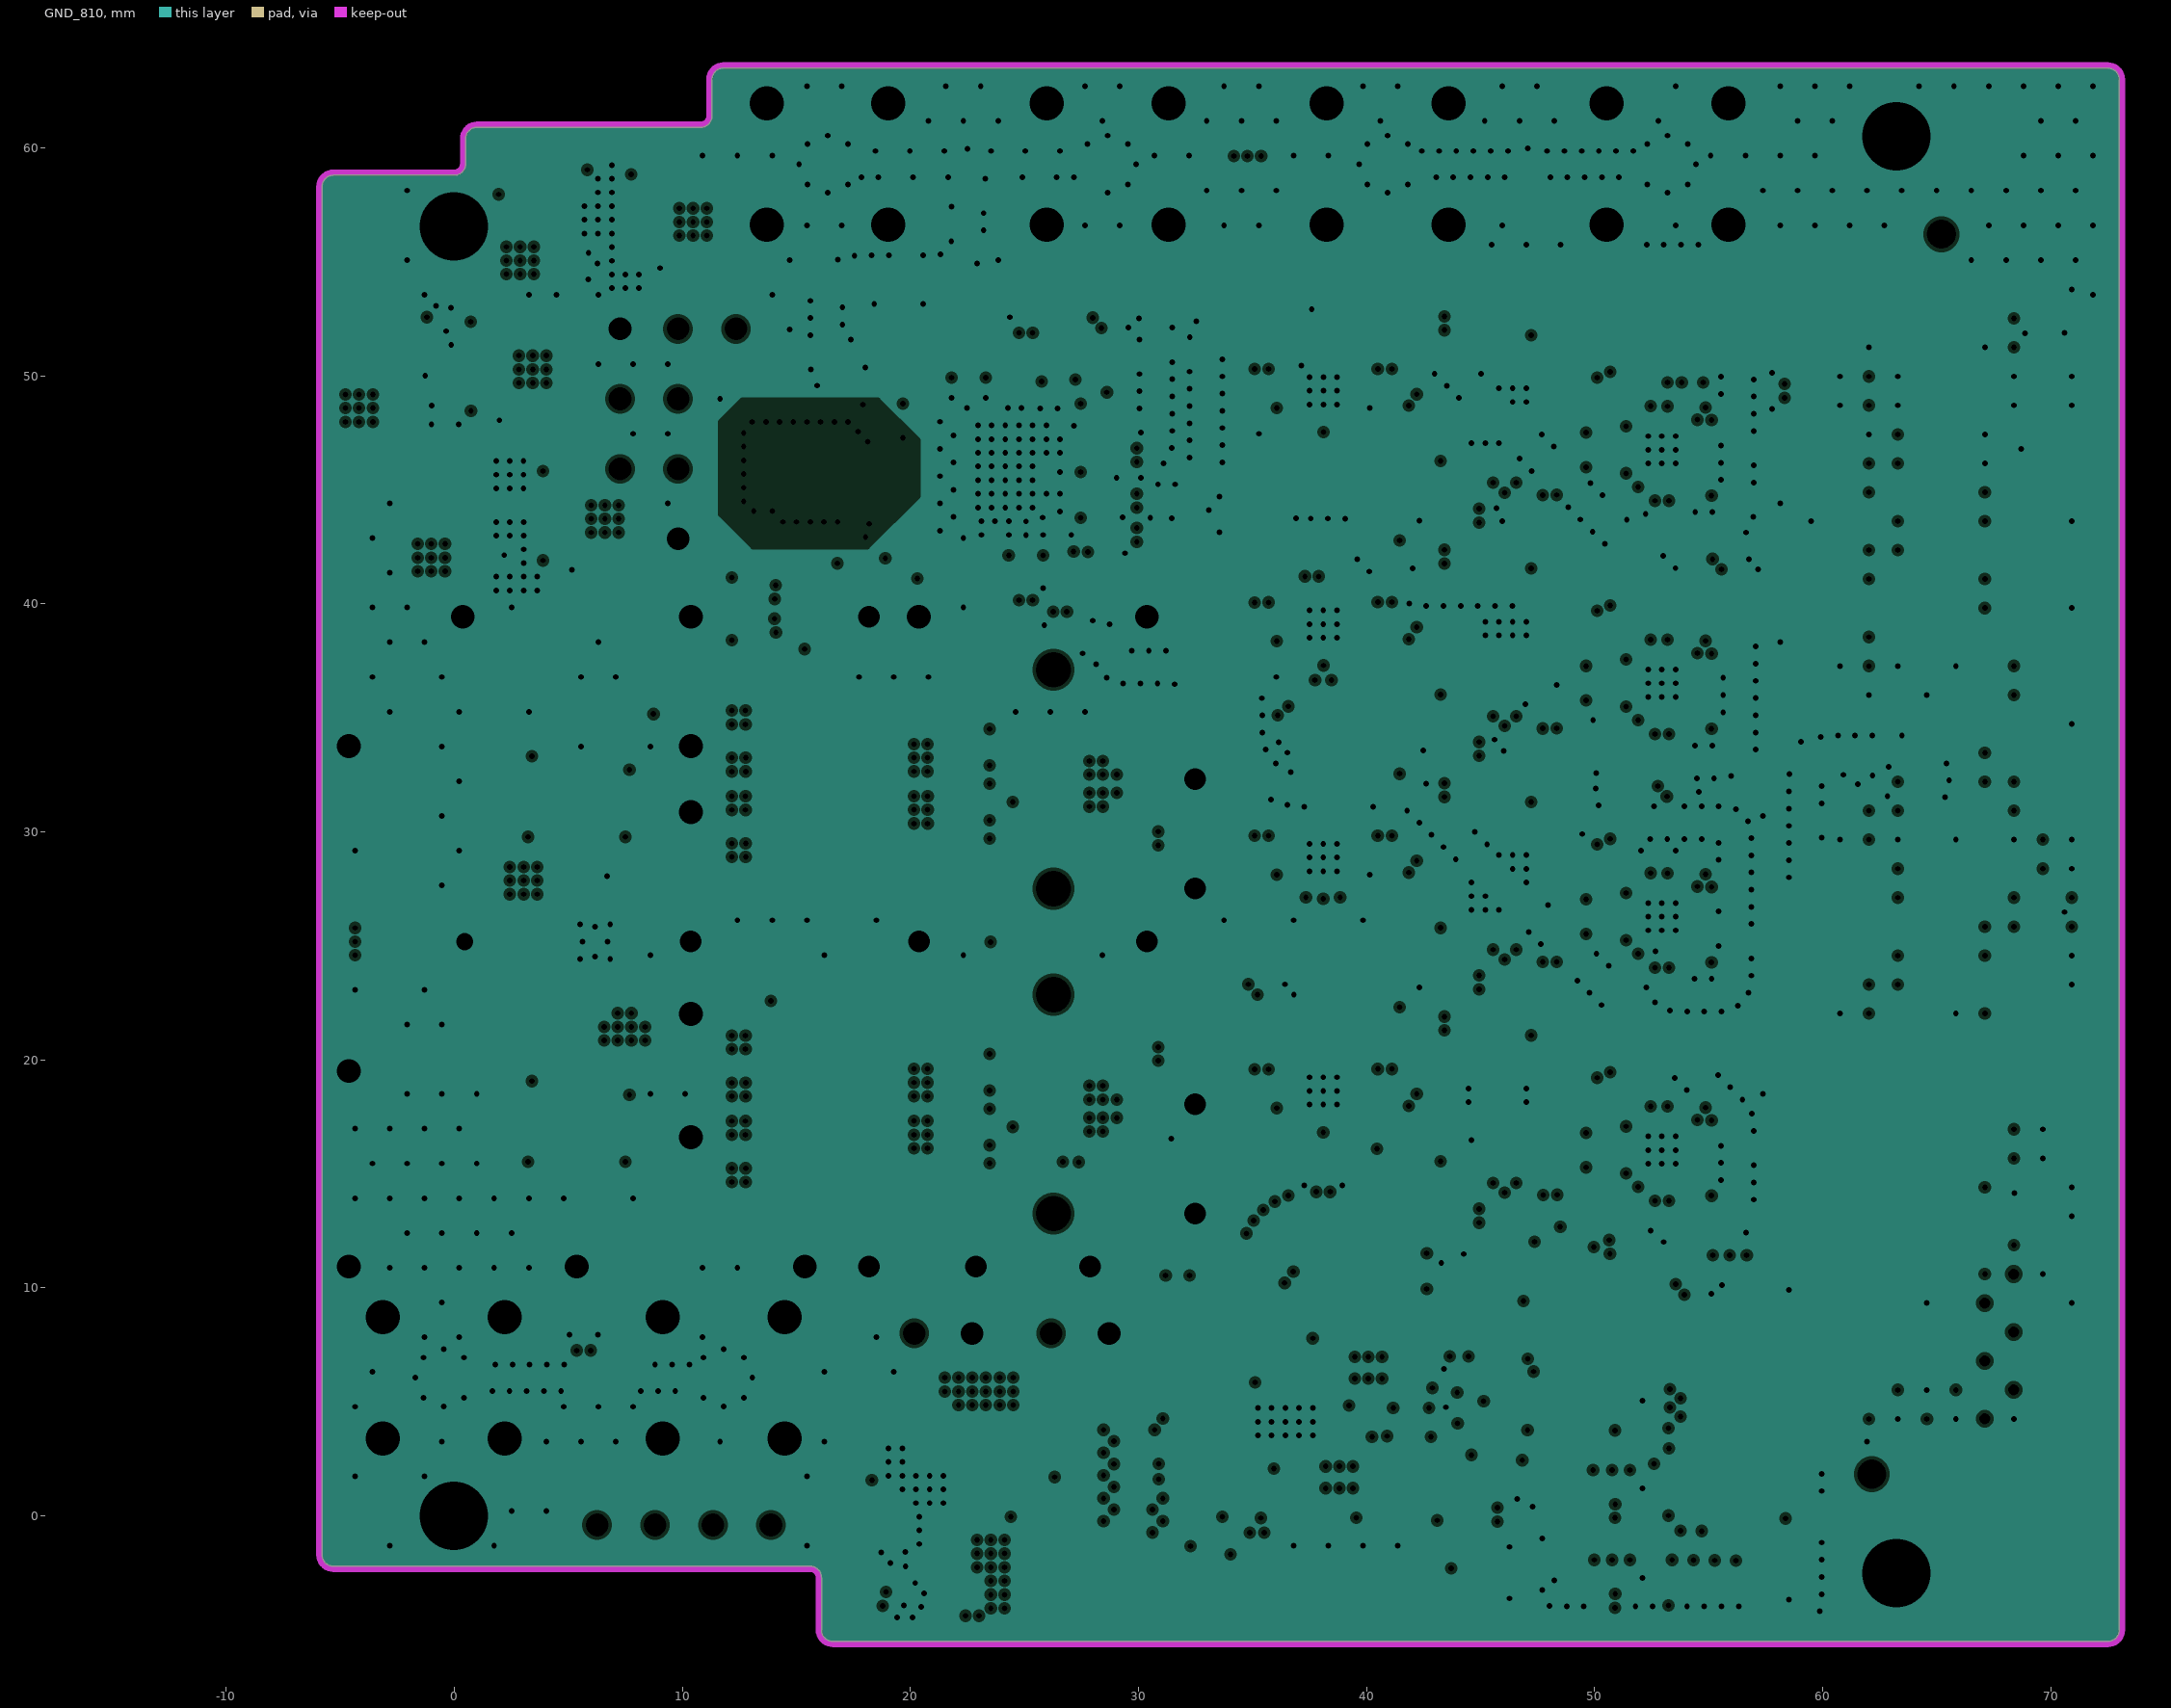
[diagram p9: GND_810, clearances drawn from the general rule]
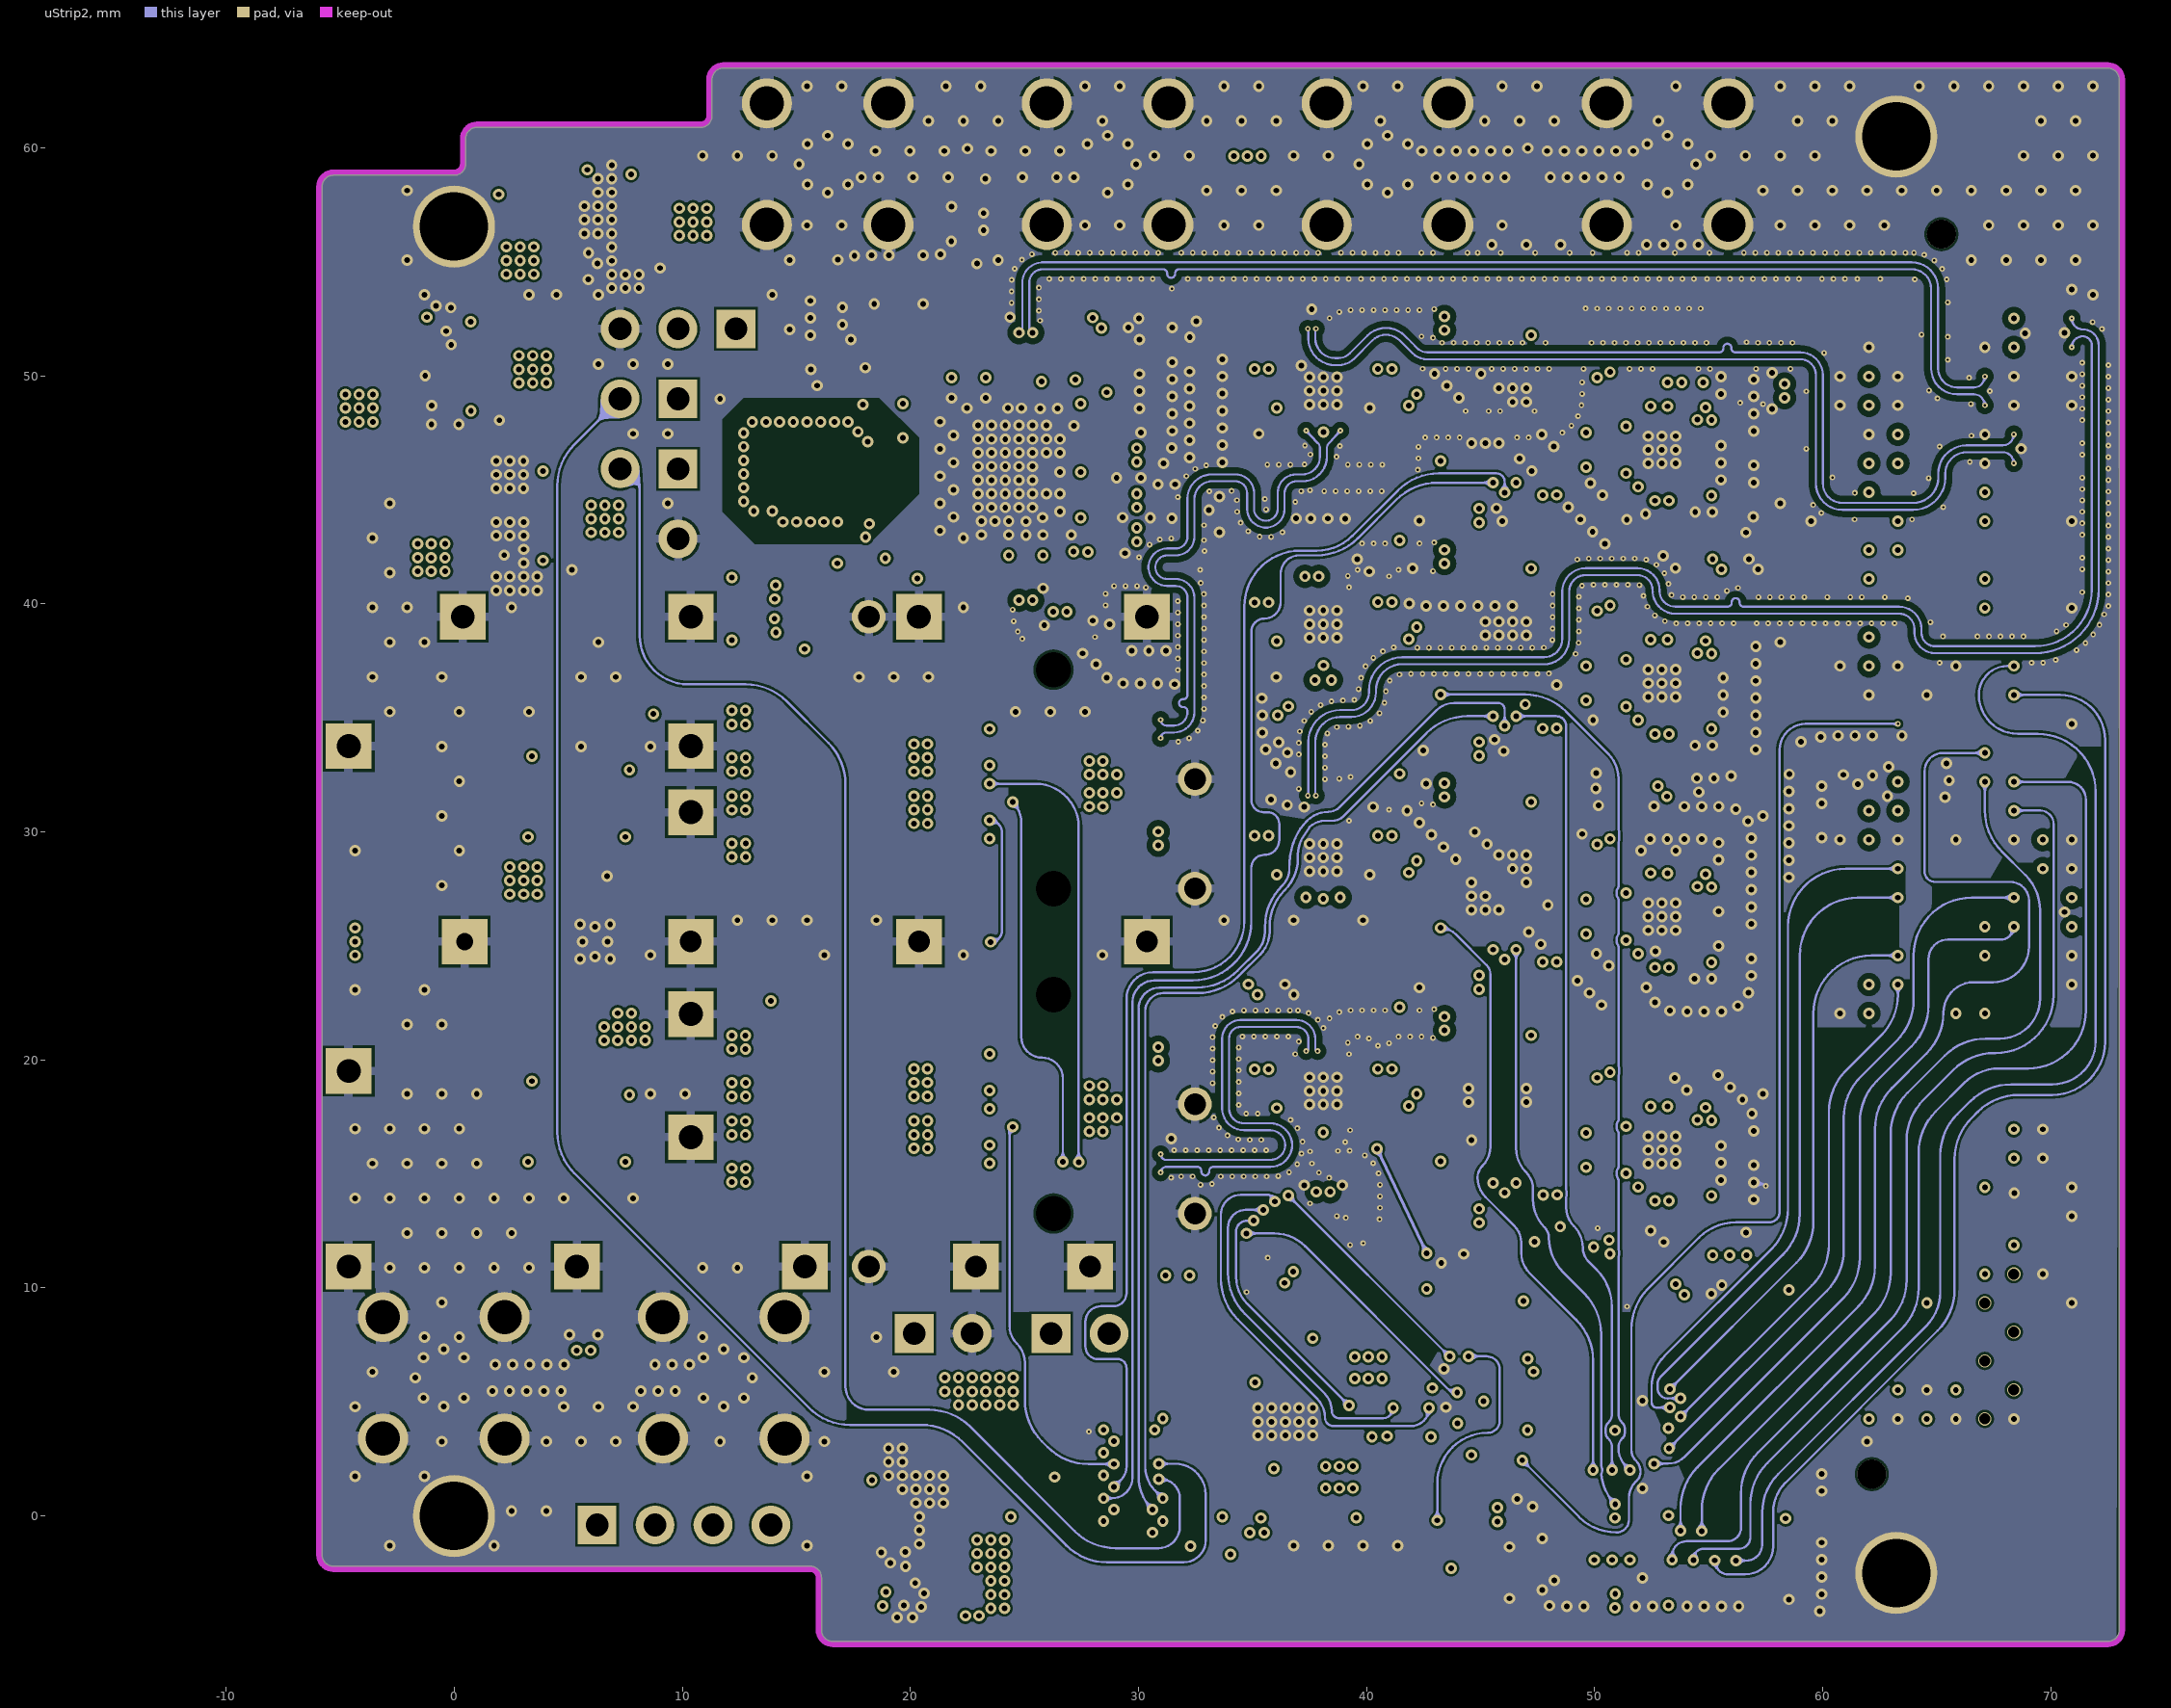
[diagram p10: uStrip2]
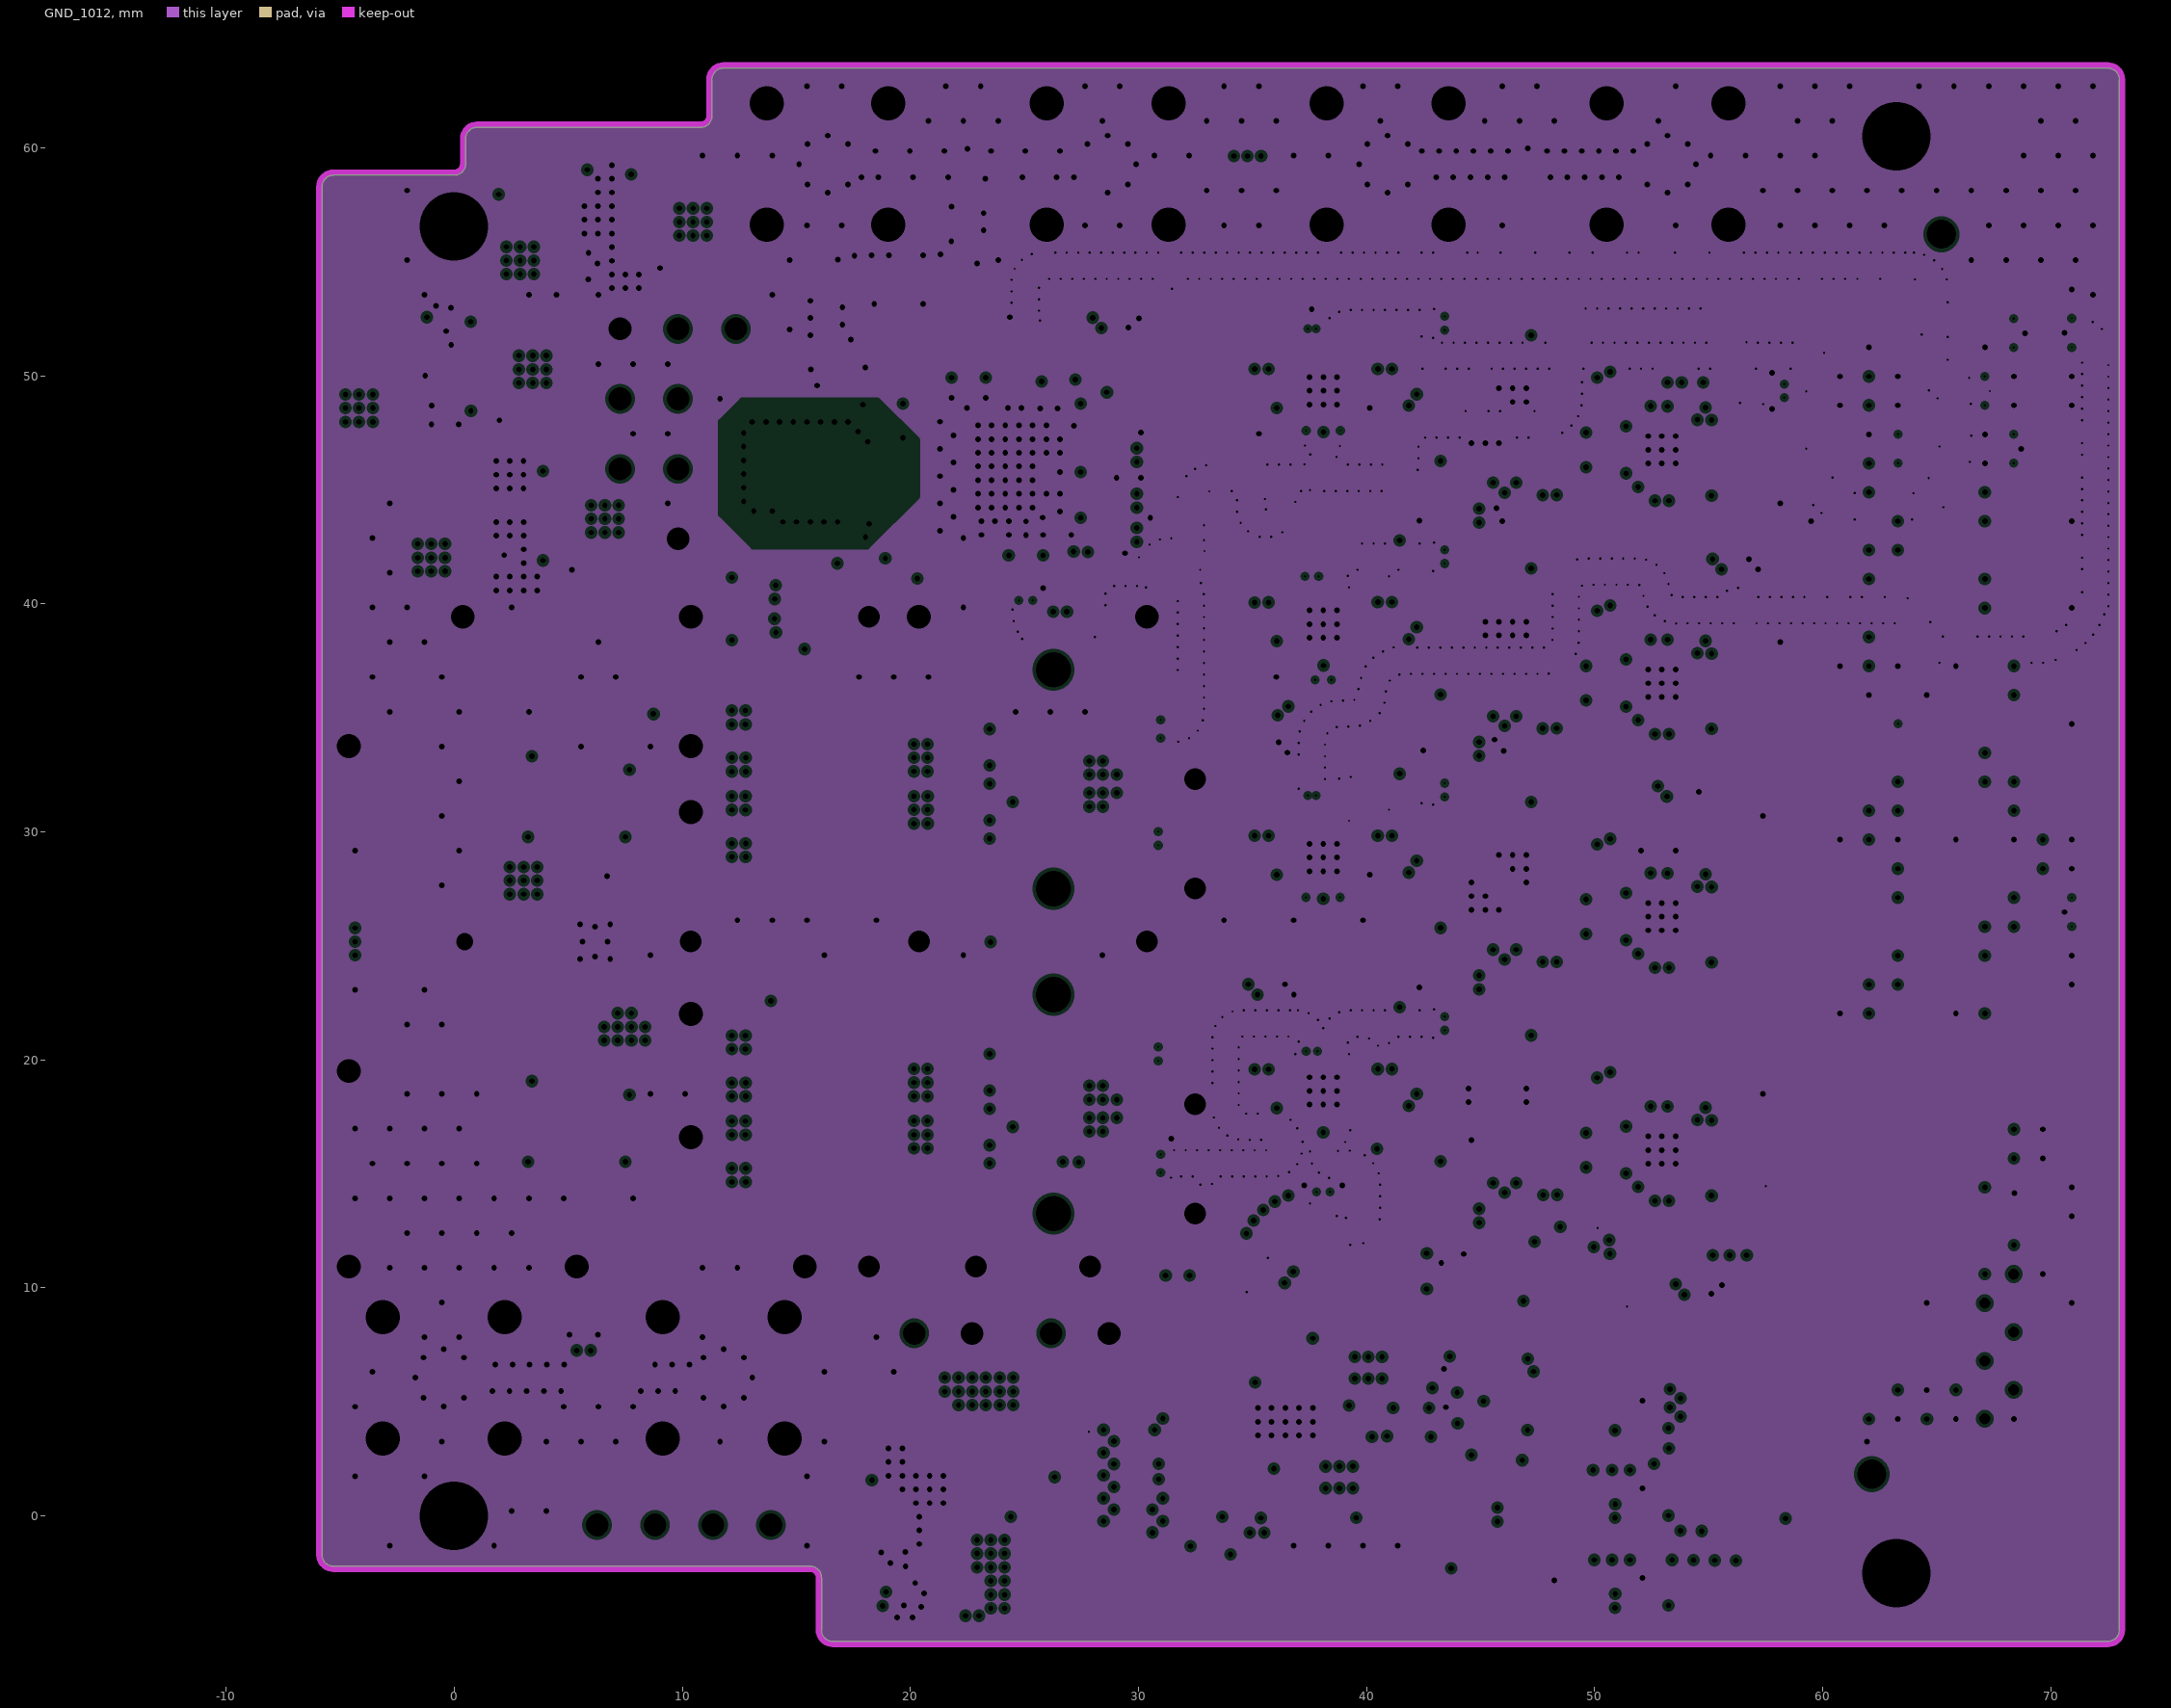
[diagram p11: GND_1012, clearances drawn from the general rule]

## Layer stack, top to bottom
Top Solder: solder mask 0.05, Solder Resist, Dk 4.6
Top Layer: signal copper 0.025
Dielectric_Top: prepreg 0.0681, R-5670G, Dk 3.19
GND_12: plane copper 0.025, net (Multiple Nets)
Dielectric_23: prepreg 0.0789, R-5670G, Dk 3.3
uStrip1: signal copper 0.025
Dielectric_34: prepreg 0.1722, R-5670G, Dk 3.15
GND_35: plane copper 0.0175, net GND
Core_45: core 0.5563, R-5775G_1035, Dk 3.75
Clocks: signal copper 0.0175
Dielectric_56: prepreg 0.085, R-5670G, Dk 3.3
GND_57: plane copper 0.0175, net GND
Core: core 0.75, R-5775G_2116, Dk 3.75
POWER: plane copper 0.0175, net (Multiple Nets)
Dielectric_78: prepreg 0.085, R-5670G, Dk 3.3
Slow_Ctrl: signal copper 0.0175
Core_89: core 0.5563, R-5775G_1035, Dk 3.75
GND_810: plane copper 0.0175, net GND
Dielectric_910: prepreg 0.1722, R-5670G, Dk 3.15
uStrip2: signal copper 0.025
Core_1011: prepreg 0.0789, R-5670G, Dk 3.3
GND_1012: plane copper 0.025, net GND
Dielectric_Bot: prepreg 0.0681, R-5670G, Dk 3.19
Bottom Layer: signal copper 0.025
Bottom Solder: solder mask 0.05, Solder Resist, Dk 4.6

## Board outline
-5.3,-2.2 cw(c-5.3,-1.7) -5.8,-1.7 -5.8,58.3 cw(c-5.3,58.3) -5.3,58.8 -2,58.8 -0.5,58.8 0,58.8 ccw(c0,59.3) 0.5,59.3 0.5,60.4 cw(c1,60.4) 1,60.9 8,60.9 10.4,60.9 10.8,60.9 ccw(c10.8,61.4) 11.3,61.4 11.3,63 cw(c11.8,63) 11.8,63.5 72.5,63.5 cw(c72.5,63) 73,63 73,-5 cw(c72.5,-5) 72.5,-5.5 16.6,-5.5 cw(c16.6,-5) 16.1,-5 16.1,-2.7 ccw(c15.6,-2.7) 15.6,-2.2 14.7,-2.2

## Design rules (kind name [scope] priority, off if disabled: settings)
BackDrilling [IsVia and InNetClass('Back-Drill')] p1: maxstublength=0.001 usetopbackdrill=TRUE usebottombackdrill=TRUE holeoversize=0.25 holetolplus=0.15 holetolminus=0.15
BoardOutlineClearance BoardOutlineClearance_gnd [IsPolygon and InNet('GND')] p1: gap=0 ignorepadtopadclearanceinfootprint=FALSE
BoardOutlineClearance [not OnBottomSilkscreen and not(HasFootprint ('20072631_NP')) and not(IsPolygon and InNet('GND'))] p2: gap=0.279 ignorepadtopadclearanceinfootprint=FALSE
Clearance Clearance_XTAL [InNet('NetIC7_7')] p1: gap=0.102 ignorepadtopadclearanceinfootprint=FALSE except(0.762: Poly-Poly Poly-Region Region-Region)
Clearance Clearance_Coplanar_via_diff [isVia and InAnyDifferentialPair and not(InNetClass('50ohm'))] p2: gap=0.102 ignorepadtopadclearanceinfootprint=FALSE except(0.254: Via-Poly Via-Region)
Clearance Clearance_Coplanar_top [InAnyDifferentialPair and not(InNetClass('50ohm')) and (OnLayer('Top Layer') or OnLayer('Bottom Layer'))] p3: gap=0.102 ignorepadtopadclearanceinfootprint=FALSE except(0.255: Arc-Poly Arc-Region Track-Poly Track-Region)
Clearance Clearance_Coplanar_ustrip [InAnyDifferentialPair and not(InNetClass('50ohm')) and (OnLayer('uStrip1') or OnLayer('uStrip2'))] p4: gap=0.102 ignorepadtopadclearanceinfootprint=FALSE except(0.258: Arc-Fill Arc-Poly Arc-Region Track-Fill Track-Poly Track-Region)
Clearance Clearance_Coplanar_clocks [InAnyDifferentialPair and not(InNetClass('50ohm')) and OnLayer('Clocks')] p5: gap=0.102 ignorepadtopadclearanceinfootprint=FALSE except(0.248: Arc-Fill Arc-Poly Arc-Region Track-Fill Track-Poly Track-Region)
Clearance Clearance_Coplanar_SE_top [InNetClass('50ohm') and (OnLayer('Top Layer') or OnLayer('Bottom Layer'))] p6: gap=0.102 ignorepadtopadclearanceinfootprint=FALSE except(0.259: Arc-Fill Arc-Poly Arc-Region Track-Fill Track-Poly Track-Region SMDPad-Fill SMDPad-Poly SMDPad-Region)
Clearance Clearance_Coplanar_SE_ustrip [InNetClass('50ohm') and (OnLayer('uStrip1') or OnLayer('uStrip2'))] p7: gap=0.102 ignorepadtopadclearanceinfootprint=FALSE except(0.267: Arc-Fill Arc-Poly Arc-Region Track-Fill Track-Poly Track-Region)
Clearance Clearance_Coplanar_SE_clocks [InNetClass('50ohm') and (OnLayer('Clocks'))] p8: gap=0.102 ignorepadtopadclearanceinfootprint=FALSE except(0.249: Arc-Fill Arc-Poly Arc-Region Track-Fill Track-Poly Track-Region)
Clearance Clearance_SMA_pad [HasFootprint('CONSMA022-G') and InNetClass('50ohm')] p9: gap=0.102 ignorepadtopadclearanceinfootprint=FALSE except(0.701: SMDPad-Fill SMDPad-Poly SMDPad-Region)
Clearance Clearance_SMA_pad_pad [HasFootprint('CONSMA022-G')] p10: gap=0.102 ignorepadtopadclearanceinfootprint=TRUE
Clearance Clearance_copper_keepout [InPolygon vs IsKeepOut and OnLayer('Keep-Out Layer')] p11: gap=0 ignorepadtopadclearanceinfootprint=FALSE
Clearance Clearance_backdrill [IsVia and InNetClass('Back-Drill') vs not(IsVia and InNetClass('Back-Drill'))] p12: gap=0.102 ignorepadtopadclearanceinfootprint=FALSE
Clearance [All] p13: gap=0.102 ignorepadtopadclearanceinfootprint=FALSE
ComponentClearance [All] p1: gap=0.127 collisioncheckmode=3 verticalgap=0 showdistances=FALSE
DiffPairsRouting [InDifferentialPairClass('All Differential Pairs')] p1: maxlimit=0.211 minlimit=0.191 mostfreqgap=0.211 toplayer_mingap=0.206 toplayer_maxgap=0.206 toplayer_prefgap=0.206 toplayer_minwidth=0.099 toplayer_maxwidth=0.099 toplayer_prefwidth=0.099 midlayer1_mingap=0.211 midlayer1_minwidth=0.094 midlayer1_maxwidth=0.094 midlayer1_prefwidth=0.094 midlayer2_maxgap=0.191 midlayer2_prefgap=0.191 midlayer2_minwidth=0.114 midlayer2_maxwidth=0.114 midlayer2_prefwidth=0.114 midlayer3_maxgap=0.191 midlayer3_prefgap=0.191 midlayer3_minwidth=0.114 midlayer3_maxwidth=0.114 midlayer3_prefwidth=0.114 midlayer4_mingap=0.211 midlayer4_minwidth=0.094 midlayer4_maxwidth=0.094 midlayer4_prefwidth=0.094 bottomlayer_mingap=0.206 bottomlayer_maxgap=0.206 bottomlayer_prefgap=0.206 bottomlayer_minwidth=0.099 bottomlayer_maxwidth=0.099 bottomlayer_prefwidth=0.099 impedanceprofiledriven=TRUE impedanceprofileid={D90F6987-28CF-499E-A8E8-8FE101B1FD0B} impedanceprofilevalue=100.000000 maxuncoupledlength=5.08
HoleSize HoleSize_laser [InDrillLayerPair('Top Layer - uStrip1') or InDrillLayerPair('uStrip2 - Bottom Layer')] p1: absolutevalues=TRUE maxlimit=0.1 minlimit=0.1 maxpercent=80.000 minpercent=20.000
HoleSize [All] p2: absolutevalues=TRUE maxlimit=6.5 minlimit=0.25 maxpercent=80.000 minpercent=20.000
HoleToHoleClearance HoleToHoleClearance_backdrill [BackDrillBottom or BackDrillTop] p1: gap=0 allowstackedmicrovias=TRUE
HoleToHoleClearance HoleToHoleClearance_laser [InDrillLayerPair('Top Layer - uStrip1') or InDrillLayerPair('uStrip2 - Bottom Layer')] p2: gap=0.25 allowstackedmicrovias=TRUE
HoleToHoleClearance [Isvia] p3: gap=0.35 allowstackedmicrovias=TRUE
HoleToHoleClearance HoleToHoleClearance_Standard [All] p4: gap=0.406 allowstackedmicrovias=TRUE
MatchedLengths Match_SFP0_FAN [InNetClass('Match_SFP0_FAN')] p1: tolerance=0.051 checknetsindiffpair=FALSE checkdiffpairvsdiffpair=TRUE checkxsignals=TRUE checkothers=TRUE
MatchedLengths Match_SFP1_FAN [InNetClass('Match_SFP1_FAN')] p2: tolerance=0.051 checknetsindiffpair=FALSE checkdiffpairvsdiffpair=TRUE checkxsignals=TRUE checkothers=TRUE
MatchedLengths Match_FAN_CDR [InNetClass('Match_FAN_CDR')] p3: tolerance=0.051 checknetsindiffpair=FALSE checkdiffpairvsdiffpair=TRUE checkxsignals=TRUE checkothers=TRUE
MatchedLengths Match_FAN_CDR_C [InNetClass('Match_FAN_CDR_C')] p4: tolerance=0.051 checknetsindiffpair=FALSE checkdiffpairvsdiffpair=TRUE checkxsignals=TRUE checkothers=TRUE
MatchedLengths Match_FAN_FPGA [InNetClass('Match_FAN_FPGA')] p5: tolerance=0.051 checknetsindiffpair=FALSE checkdiffpairvsdiffpair=TRUE checkxsignals=TRUE checkothers=TRUE
MatchedLengths Match_CDR_DFF [InNetClass('Match_CDR_DFF')] p6: tolerance=0.051 checknetsindiffpair=FALSE checkdiffpairvsdiffpair=TRUE checkxsignals=TRUE checkothers=TRUE
MatchedLengths Match_CDR_DFF_C [InNetClass('Match_CDR_DFF_C')] p7: tolerance=0.051 checknetsindiffpair=FALSE checkdiffpairvsdiffpair=TRUE checkxsignals=TRUE checkothers=TRUE
MatchedLengths Match_DFF_FPGA [InNetClass('Match_DFF_FPGA')] p8: tolerance=0.051 checknetsindiffpair=FALSE checkdiffpairvsdiffpair=TRUE checkxsignals=TRUE checkothers=TRUE
MatchedLengths Match_PLLFAN_DFF [InNetClass('Match_PLLFAN_DFF')] p9: tolerance=0.051 checknetsindiffpair=FALSE checkdiffpairvsdiffpair=TRUE checkxsignals=TRUE checkothers=TRUE
MatchedLengths Match_50Ω_in [InNetClass('Match_50ohm_in')] p10: tolerance=0.051 checknetsindiffpair=FALSE checkdiffpairvsdiffpair=TRUE checkxsignals=TRUE checkothers=TRUE
MatchedLengths Match_50Ω_out [InNetClass('Match_50ohm_out')] p11: tolerance=0.051 checknetsindiffpair=FALSE checkdiffpairvsdiffpair=TRUE checkxsignals=TRUE checkothers=TRUE
MatchedLengths Match_withinDiffPairs [InDifferentialPairClass('All Differential Pairs')] p12: tolerance=0.051 checknetsindiffpair=TRUE checkdiffpairvsdiffpair=FALSE checkxsignals=FALSE checkothers=FALSE
MinimumAnnularRing MinimumAnnularRing_laser [InDrillLayerPair('Top Layer - uStrip1') or InDrillLayerPair('uStrip2 - Bottom Layer')] p1: minimumring=0.075
MinimumAnnularRing [not IsVia] p2: minimumring=0.1
MinimumSolderMaskSliver [All] p1: minsoldermaskwidth=0.051
PlaneClearance [All] p1: clearance=0.152
PlaneConnect PlaneConnect_Frame_Hole [InPadClass('Frame-Holes')] p1: planeconnectstyle=Direct reliefexpansion=0.508 reliefentries=4 reliefconductorwidth=0.254 reliefairgap=0.254
PlaneConnect PlaneConnect_PWR [InComponentClass('PWR_Jumper') or HasFootprint('TE_282837-2')] p2: planeconnectstyle=Relief reliefexpansion=0.508 reliefentries=4 reliefconductorwidth=0.635 reliefairgap=0.178
PlaneConnect [All] p3: pad.planeconnectstyle=Relief pad.reliefexpansion=0.508 pad.reliefentries=4 pad.reliefconductorwidth=0.305 pad.reliefairgap=0.178 via.planeconnectstyle=Direct via.reliefexpansion=0.508 via.reliefentries=4 via.reliefconductorwidth=0.254 via.reliefairgap=0.254
PolygonConnect noThermal [InComponentClass('no_Thermal_Relieves')] p1: connectstyle=Direct reliefconductorwidth=0.254 reliefentries=4 polygonreliefangle="90 Angle" airgapwidth=0.254
PolygonConnect noThermal_chips [IsPad and ((ColumnCount + RowCount > 3) and (ColumnCount > 1) and (RowCount > 1)) and not(HasFootprint('SAMTEC_SMA-J-P-H-ST-MT1') or HasFootprint('20072631_NP'))] p2: connectstyle=Direct reliefconductorwidth=0.254 reliefentries=4 polygonreliefangle="90 Angle" airgapwidth=0.254 // excluding SMA and SFP cage footprints
PolygonConnect noThermal_reversed_c [IsPad and (HasFootprint('LLL03TR61E333KE01') or HasFootprint('CAPC0510X04N'))] p3: connectstyle=Direct reliefconductorwidth=0.254 reliefentries=4 polygonreliefangle="90 Angle" airgapwidth=0.254
PolygonConnect noThermal_inductor [IsPad and HasFootprint('DFE322520FD1R0MP2')] p4: connectstyle=Direct reliefconductorwidth=0.254 reliefentries=4 polygonreliefangle="90 Angle" airgapwidth=0.254
PolygonConnect noThermal_testpoint [IsPad and HasFootprint('TP+195X110')] p5: connectstyle=Direct reliefconductorwidth=0.254 reliefentries=4 polygonreliefangle="90 Angle" airgapwidth=0.254
PolygonConnect PolygonConnect_via [IsVia] p6: connectstyle=Direct reliefconductorwidth=0.254 reliefentries=4 polygonreliefangle="90 Angle" airgapwidth=0.254
PolygonConnect PolygonConnect_Huge [AsMM(PadXSize_AllLayers + PadYSize_AllLayers) > 10] p7: connectstyle=Relief reliefconductorwidth=1.524 reliefentries=4 polygonreliefangle="90 Angle" airgapwidth=0.127
PolygonConnect PolygonConnect_Very_Large [AsMM(PadXSize_AllLayers + PadYSize_AllLayers) > 4] p8: connectstyle=Relief reliefconductorwidth=0.635 reliefentries=4 polygonreliefangle="90 Angle" airgapwidth=0.127
PolygonConnect PolygonConnect_Large [AsMM(PadXSize_AllLayers + PadYSize_AllLayers) > 2.5] p9: connectstyle=Relief reliefconductorwidth=0.381 reliefentries=4 polygonreliefangle="90 Angle" airgapwidth=0.127
PolygonConnect PolygonConnect_Mid [AsMM(PadXSize_AllLayers + PadYSize_AllLayers) >= 1.2] p10: connectstyle=Relief reliefconductorwidth=0.254 reliefentries=4 polygonreliefangle="90 Angle" airgapwidth=0.127
PolygonConnect PolygonConnect_Base [All] p11: connectstyle=Relief reliefconductorwidth=0.127 reliefentries=4 polygonreliefangle="90 Angle" airgapwidth=0.127
RoutingVias RoutingVias_laser [InDrillLayerPair('Top Layer - uStrip1') or InDrillLayerPair('uStrip2 - Bottom Layer')] p1: holewidth=0.1 width=0.25 viastyle="Through Hole" minholewidth=0.1 minwidth=0.25 maxholewidth=0.1 maxwidth=0.25
RoutingVias RoutingVias_buried [InDrillLayerPair('uStrip1 - uStrip2')] p2: holewidth=0.25 width=0.5 viastyle="Through Hole" minholewidth=0.25 minwidth=0.5 maxholewidth=0.25 maxwidth=0.5
RoutingVias RoutingVias_PWR_FMC [IsVia and InNetClass('Power')] p3: holewidth=0.25 width=0.5 viastyle="Through Hole" minholewidth=0.25 minwidth=0.5 maxholewidth=0.483 maxwidth=0.61
RoutingVias [All] p4: holewidth=0.25 width=0.5 viastyle="Through Hole" minholewidth=0.25 minwidth=0.5 maxholewidth=0.4 maxwidth=0.6
SilkToSilkClearance [All] p1: silktosilkclearance=0
SilkToSolderMaskClearance [All] p1: minsilkscreentomaskgap=0.003 clearancetoexposedcopper=FALSE
SolderMaskExpansion SolderMaskExpansion_Via [IsVia] p1: expansion=0.102 istentingtop=TRUE
SolderMaskExpansion [All] p2: expansion=0 istentingtop=FALSE
Width Width_50Ω [InNetClass('50ohm')] p1: maxlimit=0.137 minlimit=0.102 preferedwidth=0.137 toplayer_minwidth=0.117 toplayer_maxwidth=0.117 toplayer_prefwidth=0.117 midlayer1_maxwidth=0.102 midlayer1_prefwidth=0.102 midlayer2_minwidth=0.137 midlayer3_minwidth=0.137 midlayer4_maxwidth=0.102 midlayer4_prefwidth=0.102 bottomlayer_minwidth=0.117 bottomlayer_maxwidth=0.117 bottomlayer_prefwidth=0.117 impedanceprofiledriven=TRUE minimp=50.000000 maximp=50.000000 favimp=50.000000
Width [All] p2: maxlimit=2.54 minlimit=0.089 preferedwidth=0.137 toplayer_prefwidth=0.117 midlayer1_prefwidth=0.102 midlayer4_prefwidth=0.102 bottomlayer_prefwidth=0.117 impedanceprofiledriven=TRUE minimp=50.000000 maximp=50.000000 favimp=50.000000
21 further rules are at their usual default settings.

## Classes and differential pairs
pad class Frame-Holes: Free-frame-holes
net class Match_FAN_CDR_C: DATA_IN_C_l0_N DATA_IN_C_l0_P DATA_IN_C_l1_N DATA_IN_C_l1_P DATA_IN_C_l2_N DATA_IN_C_l2_P DATA_IN_C_l3_N DATA_IN_C_l3_P
net class Match_CDR_DFF_C: CLOCK_OUT_C_l0_N CLOCK_OUT_C_l0_P CLOCK_OUT_C_l1_N CLOCK_OUT_C_l1_P CLOCK_OUT_C_l2_N CLOCK_OUT_C_l2_P CLOCK_OUT_C_l3_N CLOCK_OUT_C_l3_P
channel class lane: l0 l1 l2 l3
net class Match_PLL_C_DFF: DMTD_CLK_0_N DMTD_CLK_0_P DMTD_CLK_1_N DMTD_CLK_1_P DMTD_CLK_2_N DMTD_CLK_2_P DMTD_CLK_3_N DMTD_CLK_3_P
net class Back-Drill: CLK40_N CLK40_P CLN_RXUSRCLK_N CLN_RXUSRCLK_P DDCLK0_N DDCLK0_P DDCLK1_N DDCLK1_P DDCLK2_N DDCLK2_P DDCLK3_N DDCLK3_P DDCLK4_N DDCLK4_P DMTD_CLK_0_N DMTD_CLK_0_P DMTD_CLK_1_N DMTD_CLK_1_P DMTD_CLK_2_N DMTD_CLK_2_P DMTD_CLK_3_N DMTD_CLK_3_P DMTD_CLK_FPGA_N DMTD_CLK_FPGA_P GT_REFCLK_AUX_N GT_REFCLK_AUX_P IN0_N IN0_P IN1_N IN1_P PLL_OUT_N PLL_OUT_P PLL_OUTA_N PLL_OUTA_P RXUSRCLK_N RXUSRCLK_P
net class Match_SFP1_FAN: SFP_RX1_N SFP_RX1_P SFP_TX1_N SFP_TX1_P
net class Match_SFP0_FAN: SFP_RX0_N SFP_RX0_P SFP_TX0_N SFP_TX0_P
net class Match_FAN_CDR: IN_l0_N IN_l0_P IN_l1_N IN_l1_P IN_l2_N IN_l2_P IN_l3_N IN_l3_P
net class Match_CDR_DFF: CLOCK_OUT_l0_N CLOCK_OUT_l0_P CLOCK_OUT_l1_N CLOCK_OUT_l1_P CLOCK_OUT_l2_N CLOCK_OUT_l2_P CLOCK_OUT_l3_N CLOCK_OUT_l3_P
net class 50ohm: NetC91_2 NetC96_2 PLL_IN_AUX_N PLL_IN_AUX_P PLL_SMA_OUT_N PLL_SMA_OUT_P
component class U_phase-shifters: C131 C132 C133 C134 C135 C136 C137 C138 C139 C140 C141 C142 C143 C144 C145 C146 C147 C148 C149 C150 C151 IC12 ICx1 Q12 R74 R75 R76 R77 R78 R79 R80 R81 R82 R83 R84 TP12 TP13 TP14 TP15 TP16 TP17 TP18 TP19 U6 U7 U8 U9 U10
net class Power: 1V8 1VPSF 3V3APLL 3V3CDR P2V05 P3V3 P3V3A P3V6 P12V VADJ VREFAC
component class U_SFP: C69 C70 C71 C72 C73 C74 C75 C76 C77 C78 C79 C80 IC8 J1 J2 J3 L2 L3 L4 L5 LED2 LED3 LED4 LED5 Q6 Q7 Q8 Q9 R41 R42 R43 R44 R45 R46 R47 R48 R49 R50 R51 R52 R53 R54 R55 R56 W1 W2 W3
component class U_PLL: C97 C98 C99 C100 C101 C102 C103 C104 C105 C106 C107 C108 C109 C110 C111 C112 C113 C114 C115 C116 C117 C118 C119 C120 C121 C122 C123 C124 C125 C126 C127 C128 C129 C130 D5 IC11 J7 J8 J9 J10 Q10 Q11 R65 R66 R67 R68 R69 R70 R71 R72 R73 TP11 W4 W5 W6 W7
component class U_FMC: C81 C82 C83 C84 C85 C86 C87 C88 C89 C90 C91 C92 C93 C94 C95 C96 IC9 IC10 J4 J5 J6 R57 R58 R59 R60 R61 R62 R63 R64 RN1 RN2 RN3 TP8 TP9 TP10 U4 U5
differential pair IN_l3: +IN_l3_P -IN_l3_N
differential pair IN_l2: +IN_l2_P -IN_l2_N
differential pair IN_l1: +IN_l1_P -IN_l1_N
differential pair IN_l0: +IN_l0_P -IN_l0_N
differential pair DATA_IN_C_l3: +DATA_IN_C_l3_P -DATA_IN_C_l3_N
differential pair DATA_IN_C_l2: +DATA_IN_C_l2_P -DATA_IN_C_l2_N
differential pair DATA_IN_C_l1: +DATA_IN_C_l1_P -DATA_IN_C_l1_N
differential pair DATA_IN_C_l0: +DATA_IN_C_l0_P -DATA_IN_C_l0_N
differential pair CLOCK_OUT_l3: +CLOCK_OUT_l3_P -CLOCK_OUT_l3_N
differential pair CLOCK_OUT_l2: +CLOCK_OUT_l2_P -CLOCK_OUT_l2_N
differential pair CLOCK_OUT_l1: +CLOCK_OUT_l1_P -CLOCK_OUT_l1_N
differential pair CLOCK_OUT_l0: +CLOCK_OUT_l0_P -CLOCK_OUT_l0_N
differential pair CLOCK_OUT_C_l3: +CLOCK_OUT_C_l3_P -CLOCK_OUT_C_l3_N
differential pair CLOCK_OUT_C_l2: +CLOCK_OUT_C_l2_P -CLOCK_OUT_C_l2_N
differential pair CLOCK_OUT_C_l1: +CLOCK_OUT_C_l1_P -CLOCK_OUT_C_l1_N
differential pair CLOCK_OUT_C_l0: +CLOCK_OUT_C_l0_P -CLOCK_OUT_C_l0_N
differential pair BEAT_l3: +BEAT_l3_P -BEAT_l3_N
differential pair BEAT_l2: +BEAT_l2_P -BEAT_l2_N
differential pair BEAT_l1: +BEAT_l1_P -BEAT_l1_N
differential pair BEAT_l0: +BEAT_l0_P -BEAT_l0_N
differential pair DMTD_CLK_3: +DMTD_CLK_3_P -DMTD_CLK_3_N
differential pair DMTD_CLK_2: +DMTD_CLK_2_P -DMTD_CLK_2_N
differential pair DMTD_CLK_1: +DMTD_CLK_1_P -DMTD_CLK_1_N
differential pair DMTD_CLK_0: +DMTD_CLK_0_P -DMTD_CLK_0_N
differential pair SFP_TX1: +SFP_TX1_P -SFP_TX1_N
differential pair SFP_TX0: +SFP_TX0_P -SFP_TX0_N
differential pair SFP_RX1: +SFP_RX1_P -SFP_RX1_N
differential pair SFP_RX0: +SFP_RX0_P -SFP_RX0_N
differential pair FPGA_TX0_C: +FPGA_TX0_C_P -FPGA_TX0_C_N
differential pair FPGA_RX1: +FPGA_RX1_P -FPGA_RX1_N
differential pair FPGA_RX0: +FPGA_RX0_P -FPGA_RX0_N
differential pair PSF_IN: +PSF_IN_P -PSF_IN_N
differential pair PSF_IN_C: +PSF_IN_C_P -PSF_IN_C_N
differential pair FPGA_TX1_PS: +FPGA_TX1_PS_P -FPGA_TX1_PS_N
differential pair CLK40: +CLK40_P -CLK40_N
differential pair RXUSRCLK: +RXUSRCLK_P -RXUSRCLK_N
differential pair IN0: +IN0_P -IN0_N
differential pair FPGA_TX1_C: +FPGA_TX1_C_P -FPGA_TX1_C_N
differential pair FPGA_TX1: +FPGA_TX1_P -FPGA_TX1_N
differential pair FPGA_TX0: +FPGA_TX0_P -FPGA_TX0_N
differential pair FPGA_RX1_C: +FPGA_RX1_C_P -FPGA_RX1_C_N
differential pair FPGA_RX0_C: +FPGA_RX0_C_P -FPGA_RX0_C_N
differential pair PLL_OUT: +PLL_OUT_P -PLL_OUT_N
differential pair PLL_OUTA: +PLL_OUTA_P -PLL_OUTA_N
differential pair IN1: +IN1_P -IN1_N
differential pair GT_REFCLK_AUX: +GT_REFCLK_AUX_P -GT_REFCLK_AUX_N
differential pair FB_OUT: +FB_OUT_P -FB_OUT_N
differential pair FB_IN: +FB_IN_P -FB_IN_N
differential pair DMTD_CLK_FPGA: +DMTD_CLK_FPGA_P -DMTD_CLK_FPGA_N
differential pair DDCLK4: +DDCLK4_P -DDCLK4_N
differential pair DDCLK3: +DDCLK3_P -DDCLK3_N
differential pair DDCLK2: +DDCLK2_P -DDCLK2_N
differential pair DDCLK1: +DDCLK1_P -DDCLK1_N
differential pair DDCLK0: +DDCLK0_P -DDCLK0_N
differential pair CLN_RXUSRCLK: +CLN_RXUSRCLK_P -CLN_RXUSRCLK_N
differential pair BEAT_3: +BEAT_3_P -BEAT_3_N
differential pair BEAT_2: +BEAT_2_P -BEAT_2_N
differential pair BEAT_1: +BEAT_1_P -BEAT_1_N
differential pair BEAT_0: +BEAT_0_P -BEAT_0_N

## Components (designator, comment, footprint, x,y, rotation, side; value= is the part's Value field where it differs from the comment)
C1_l0 "470nF" CAPC0510X04N 52.947,45.476 r270 bottom (schematic designator C1)
C1_l1 "470nF" CAPC0510X04N 52.949,14.774 r270 bottom (schematic designator C1)
C1_l2 "470nF" CAPC0510X04N 52.945,25.006 r270 bottom (schematic designator C1)
C1_l3 "470nF" CAPC0510X04N 52.949,35.249 r270 bottom (schematic designator C1)
C2_l0 "33nF" LLL03TR61E333KE01 53.957,47.884 r90 bottom (schematic designator C2)
C2_l1 "33nF" LLL03TR61E333KE01 53.956,17.176 r90 bottom (schematic designator C2)
C2_l2 "33nF" LLL03TR61E333KE01 53.957,27.424 r90 bottom (schematic designator C2)
C2_l3 "33nF" LLL03TR61E333KE01 53.957,37.66 r90 bottom (schematic designator C2)
C3_l0 "10uF" CAPC1608X87N 56.167,41.741 r180 top (schematic designator C3)
C3_l1 "10uF" CAPC1608X87N 53.768,31.786 r180 top (schematic designator C3)
C3_l2 "10uF" CAPC1608X87N 54.543,9.936 r180 top (schematic designator C3)
C3_l3 "10uF" CAPC1608X87N 35.814,23.091 r180 top (schematic designator C3)
C4_l0 "470nF" CAPC0510X04N 54.966,47.486 r90 bottom (schematic designator C4)
C4_l1 "470nF" CAPC0510X04N 54.966,16.778 r90 bottom (schematic designator C4)
C4_l2 "470nF" CAPC0510X04N 54.966,27.021 r90 bottom (schematic designator C4)
C4_l3 "470nF" CAPC0510X04N 54.966,37.24 r90 bottom (schematic designator C4)
C5_l0 "33nF" LLL03TR61E333KE01 52.436,48.345 r90 bottom (schematic designator C5)
C5_l1 "33nF" LLL03TR61E333KE01 52.436,17.647 r90 bottom (schematic designator C5)
C5_l2 "33nF" LLL03TR61E333KE01 52.436,27.855 r90 bottom (schematic designator C5)
C5_l3 "33nF" LLL03TR61E333KE01 52.436,38.117 r90 bottom (schematic designator C5)
C6_l0 "10uF" CAPC1608X87N 43.47,28.649 r180 bottom (schematic designator C6)
C6_l1 "10uF" CAPC1608X87N 43.47,38.899 r180 bottom (schematic designator C6)
C6_l2 "10uF" CAPC1608X87N 43.47,18.428 r180 bottom (schematic designator C6)
C6_l3 "10uF" CAPC1608X87N 43.47,49.109 r180 bottom (schematic designator C6)
C7_l0 "470nF" CAPC0510X04N 47.616,52.695 r180 top (schematic designator C7)
C7_l1 "470nF" CAPC0510X04N 47.616,21.99 r180 top (schematic designator C7)
C7_l2 "470nF" CAPC0510X04N 47.616,32.224 r180 top (schematic designator C7)
C7_l3 "470nF" CAPC0510X04N 47.616,42.471 r180 top (schematic designator C7)
C8_l0 "33nF" LLL03TR61E333KE01 47.66,51.622 r180 top (schematic designator C8)
C8_l1 "33nF" LLL03TR61E333KE01 47.66,20.871 r180 top (schematic designator C8)
C8_l2 "33nF" LLL03TR61E333KE01 47.66,31.107 r180 top (schematic designator C8)
C8_l3 "33nF" LLL03TR61E333KE01 47.66,41.343 r180 top (schematic designator C8)
C9_l0 "470nF" CAPC0510X04N 50.346,49.288 r90 top (schematic designator C9)
C9_l1 "470nF" CAPC0510X04N 50.346,18.584 r90 top (schematic designator C9)
C9_l2 "470nF" CAPC0510X04N 50.346,28.825 r90 top (schematic designator C9)
C9_l3 "470nF" CAPC0510X04N 50.346,39.058 r90 top (schematic designator C9)
C10_l0 "33nF" LLL03TR61E333KE01 49.117,49.337 r90 top (schematic designator C10)
C10_l1 "33nF" LLL03TR61E333KE01 49.117,18.619 r90 top (schematic designator C10)
C10_l2 "33nF" LLL03TR61E333KE01 49.117,28.858 r90 top (schematic designator C10)
C10_l3 "33nF" LLL03TR61E333KE01 49.117,39.085 r90 top (schematic designator C10)
C11_l0 "33nF" LLL03TR61E333KE01 53.199,48.175 r90 bottom (schematic designator C11)
C11_l1 "33nF" LLL03TR61E333KE01 53.199,17.466 r90 bottom (schematic designator C11)
C11_l2 "33nF" LLL03TR61E333KE01 53.199,27.703 r90 bottom (schematic designator C11)
C11_l3 "33nF" LLL03TR61E333KE01 53.199,37.939 r90 bottom (schematic designator C11)
C12_l0 "22uF" MURATA_HI_DENSITY_0402_CAP 56.756,47.198 r180 top (schematic designator C12)
C12_l1 "22uF" MURATA_HI_DENSITY_0402_CAP 56.756,16.488 r180 top (schematic designator C12)
C12_l2 "22uF" MURATA_HI_DENSITY_0402_CAP 56.756,26.725 r180 top (schematic designator C12)
C12_l3 "22uF" MURATA_HI_DENSITY_0402_CAP 56.756,36.961 r180 top (schematic designator C12)
C13_l0 "100nF" MURATA_HI_DENSITY_0201 50.224,47 r0 top (schematic designator C13)
C13_l1 "100nF" MURATA_HI_DENSITY_0201 50.224,16.29 r0 top (schematic designator C13)
C13_l2 "100nF" MURATA_HI_DENSITY_0201 50.224,26.527 r0 top (schematic designator C13)
C13_l3 "100nF" MURATA_HI_DENSITY_0201 50.224,36.763 r0 top (schematic designator C13)
C14_l0 "470nF" CAPC0510X04N 44.328,43.898 r0 top (schematic designator C14)
C14_l1 "470nF" CAPC0510X04N 44.328,13.184 r0 top (schematic designator C14)
C14_l2 "470nF" CAPC0510X04N 44.328,23.428 r0 top (schematic designator C14)
C14_l3 "470nF" CAPC0510X04N 44.328,33.656 r0 top (schematic designator C14)
C15_l0 "33nF" LLL03TR61E333KE01 44.363,45.042 r0 top (schematic designator C15)
C15_l1 "33nF" LLL03TR61E333KE01 44.363,14.337 r0 top (schematic designator C15)
C15_l2 "33nF" LLL03TR61E333KE01 44.363,24.543 r0 top (schematic designator C15)
C15_l3 "33nF" LLL03TR61E333KE01 44.363,34.746 r0 top (schematic designator C15)
C16_l0 "470nF" CAPC0510X04N 48.029,44.191 r90 top (schematic designator C16)
C16_l1 "470nF" CAPC0510X04N 48.029,13.487 r90 top (schematic designator C16)
C16_l2 "470nF" CAPC0510X04N 48.029,23.711 r90 top (schematic designator C16)
C16_l3 "470nF" CAPC0510X04N 48.029,33.953 r90 top (schematic designator C16)
C17_l0 "33nF" LLL03TR61E333KE01 47.365,45.077 r0 top (schematic designator C17)
C17_l1 "33nF" LLL03TR61E333KE01 47.365,14.343 r0 top (schematic designator C17)
C17_l2 "33nF" LLL03TR61E333KE01 47.365,24.56 r0 top (schematic designator C17)
C17_l3 "33nF" LLL03TR61E333KE01 47.365,34.78 r0 top (schematic designator C17)
C18_l0 "100nF" MURATA_HI_DENSITY_0201 50.224,46.519 r0 top (schematic designator C18)
C18_l1 "100nF" MURATA_HI_DENSITY_0201 50.224,15.81 r0 top (schematic designator C18)
C18_l2 "100nF" MURATA_HI_DENSITY_0201 50.224,26.046 r0 top (schematic designator C18)
C18_l3 "100nF" MURATA_HI_DENSITY_0201 50.224,36.283 r0 top (schematic designator C18)
C19_l0 "470nF" CAPC0510X04N 35.422,49.549 r90 bottom (schematic designator C19)
C19_l1 "470nF" CAPC0510X04N 35.422,29.081 r90 bottom (schematic designator C19)
C19_l2 "470nF" CAPC0510X04N 40.777,19.042 r90 bottom (schematic designator C19)
C19_l3 "470nF" CAPC0510X04N 35.422,39.312 r90 bottom (schematic designator C19)
C20_l0 "33nF" LLL03TR61E333KE01 35.99,50.704 r270 bottom (schematic designator C20)
C20_l1 "33nF" LLL03TR61E333KE01 35.99,30.235 r270 bottom (schematic designator C20)
C20_l2 "33nF" LLL03TR61E333KE01 40.253,19.994 r270 bottom (schematic designator C20)
C20_l3 "33nF" LLL03TR61E333KE01 35.99,40.468 r270 bottom (schematic designator C20)
C21_l0 "470nF" CAPC0510X04N 40.777,49.549 r90 bottom (schematic designator C21)
C21_l1 "470nF" CAPC0510X04N 40.777,29.078 r90 bottom (schematic designator C21)
C21_l2 "470nF" CAPC0510X04N 35.422,19.034 r90 bottom (schematic designator C21)
C21_l3 "470nF" CAPC0510X04N 40.777,39.322 r90 bottom (schematic designator C21)
C22_l0 "33nF" LLL03TR61E333KE01 40.253,50.705 r270 bottom (schematic designator C22)
C22_l1 "33nF" LLL03TR61E333KE01 40.253,30.224 r270 bottom (schematic designator C22)
C22_l2 "33nF" LLL03TR61E333KE01 35.99,19.987 r270 bottom (schematic designator C22)
C22_l3 "33nF" LLL03TR61E333KE01 40.253,40.467 r270 bottom (schematic designator C22)
C23_l0 "33nF" LLL03TR61E333KE01 51.737,46.759 r180 bottom (schematic designator C23)
C23_l1 "33nF" LLL03TR61E333KE01 51.737,16.051 r180 bottom (schematic designator C23)
C23_l2 "33nF" LLL03TR61E333KE01 51.737,26.283 r180 bottom (schematic designator C23)
C23_l3 "33nF" LLL03TR61E333KE01 51.737,36.519 r180 bottom (schematic designator C23)
C24_l0 "22uF" MURATA_HI_DENSITY_0402_CAP 56.756,46.321 r180 top (schematic designator C24)
C24_l1 "22uF" MURATA_HI_DENSITY_0402_CAP 56.756,15.612 r180 top (schematic designator C24)
C24_l2 "22uF" MURATA_HI_DENSITY_0402_CAP 56.756,25.848 r180 top (schematic designator C24)
C24_l3 "22uF" MURATA_HI_DENSITY_0402_CAP 56.756,36.085 r180 top (schematic designator C24)
C25_l0 "33nF" LLL03TR61E333KE01 55.102,45.419 r270 top (schematic designator C25)
C25_l1 "33nF" LLL03TR61E333KE01 55.102,14.709 r270 top (schematic designator C25)
C25_l2 "33nF" LLL03TR61E333KE01 55.102,24.954 r270 top (schematic designator C25)
C25_l3 "33nF" LLL03TR61E333KE01 55.102,35.205 r270 top (schematic designator C25)
C26_l0 "470nF" CAPC0510X04N 42.198,49.728 r270 top (schematic designator C26)
C26_l1 "470nF" CAPC0510X04N 42.198,19.022 r270 top (schematic designator C26)
C26_l2 "470nF" CAPC0510X04N 42.198,29.258 r270 top (schematic designator C26)
C26_l3 "470nF" CAPC0510X04N 42.198,39.496 r270 top (schematic designator C26)
C27_l0 "33nF" LLL03TR61E333KE01 42.365,48.325 r90 top (schematic designator C27)
C27_l1 "33nF" LLL03TR61E333KE01 42.365,17.611 r90 top (schematic designator C27)
C27_l2 "33nF" LLL03TR61E333KE01 42.365,27.853 r90 top (schematic designator C27)
C27_l3 "33nF" LLL03TR61E333KE01 42.365,38.087 r90 top (schematic designator C27)
C28_l0 "100nF" MURATA_HI_DENSITY_0201 46.549,51.621 r270 top (schematic designator C28)
C28_l1 "100nF" MURATA_HI_DENSITY_0201 46.551,20.91 r270 top (schematic designator C28)
C28_l2 "100nF" MURATA_HI_DENSITY_0201 46.549,31.149 r270 top (schematic designator C28)
C28_l3 "100nF" MURATA_HI_DENSITY_0201 46.551,41.383 r270 top (schematic designator C28)
C29_l0 "100nF" MURATA_HI_DENSITY_0201 43.144,52.551 r0 bottom (schematic designator C29)
C29_l1 "100nF" MURATA_HI_DENSITY_0201 43.144,21.842 r0 bottom (schematic designator C29)
C29_l2 "100nF" MURATA_HI_DENSITY_0201 43.144,32.078 r0 bottom (schematic designator C29)
C29_l3 "100nF" MURATA_HI_DENSITY_0201 43.144,42.315 r0 bottom (schematic designator C29)
C30_l0 "100nF" MURATA_HI_DENSITY_0201 43.144,52.069 r0 bottom (schematic designator C30)
C30_l1 "100nF" MURATA_HI_DENSITY_0201 43.144,21.36 r0 bottom (schematic designator C30)
C30_l2 "100nF" MURATA_HI_DENSITY_0201 43.144,31.596 r0 bottom (schematic designator C30)
C30_l3 "100nF" MURATA_HI_DENSITY_0201 43.144,41.832 r0 bottom (schematic designator C30)
C31_l0 "33nF" LLL03TR61E333KE01 38.1,48.145 r270 top (schematic designator C31)
C31_l1 "33nF" LLL03TR61E333KE01 38.1,17.437 r270 top (schematic designator C31)
C31_l2 "33nF" LLL03TR61E333KE01 38.091,27.674 r270 top (schematic designator C31)
C31_l3 "33nF" LLL03TR61E333KE01 38.1,37.91 r270 top (schematic designator C31)
C32_l0 "470nF" CAPC2013X140N 41.736,46.185 r270 top (schematic designator C32)
C32_l1 "470nF" CAPC2013X140N 41.736,15.476 r270 top (schematic designator C32)
C32_l2 "470nF" CAPC2013X140N 41.736,25.712 r270 top (schematic designator C32)
C32_l3 "470nF" CAPC2013X140N 41.736,35.948 r270 top (schematic designator C32)
C33 "100nF" MURATA_HI_DENSITY_0201 0.602,50.961 r180 bottom
C34 "10uF" CAPC1608X87N -1.779,48.696 r180 top
C35 "10uF" CAPC1608X87N 1.984,48.856 r90 top
C36 "1uF" CAPC1005X55N -4.311,52.242 r0 top
C37 "22uF" MURATA_HI_DENSITY_0402_CAP 1.048,53.225 r0 top
C38 "470nF" CAPC0510X04N 1.871,52.01 r180 top
C39 "1uF" CAPC1005X55N -3.566,51.111 r0 top
C40 "100nF" MURATA_HI_DENSITY_0402_CAP 20.81,-1.92 r180 top value=22uF
C41 "100nF" MURATA_HI_DENSITY_0402_CAP 18.507,0.59 r270 top value=22uF
C42 "100nF" MURATA_HI_DENSITY_0402_CAP 20.985,2.489 r180 top value=22uF
C43 "10uF" CAPC1608X87N 21.203,-3.167 r0 top
C44 "22uF" MURATA_HI_DENSITY_0402_CAP 20.985,3.343 r0 top
C45 "22uF" MURATA_HI_DENSITY_0402_CAP 20.985,4.197 r0 top
C46 "10uF" CAPC1608X87N 5.28,55.168 r180 top
C47 "10uF" CAPC1608X87N 9.016,55.318 r90 top
C48 "22pF" MURATA_HI_DENSITY_0402_CAP 18.122,-4.422 r0 top value=22uF
C49 "1uF" CAPC1005X55N 2.729,58.702 r0 top
C50 "22uF" MURATA_HI_DENSITY_0402_CAP 8.065,59.687 r0 top
C51 "470nF" CAPC0510X04N 8.89,58.695 r180 top
C52 "1uF" CAPC1005X55N 3.467,57.573 r0 top
C53 "22uF" MURATA_HI_DENSITY_0402_CAP 5.176,28.391 r180 top
C54 "22uF" MURATA_HI_DENSITY_0402_CAP 5.176,27.563 r180 top
C55 "22uF" MURATA_HI_DENSITY_0402_CAP 6.195,22.162 r0 top
C56 "10uF" CAPC1608X87N 1.386,42.14 r180 top
C57 "10uF" CAPC1608X87N 5.149,42.299 r90 top
C58 "1uF" CAPC1005X55N -1.102,45.737 r0 top
C59 "22uF" MURATA_HI_DENSITY_0402_CAP 4.312,46.679 r0 top
C60 "470nF" CAPC0510X04N 5.025,45.682 r180 top
C61 "1uF" CAPC1005X55N -0.4,44.555 r0 top
C62 "10uF" CAPC1608X87N 38.806,2.975 r270 bottom
C63 "22pF" MURATA_HI_DENSITY_0402_CAP 2.884,59.453 r180 bottom value=22uF
C64 "220nF" CAPC0603X33N 38.408,5.138 r90 bottom
C65 "10uF" CAPC1608X87N 40.077,5.222 r90 bottom
C66 "33nF" LLL03TR61E333KE01 36.142,6.568 r180 bottom
C67 "10uF" CAPC1608X87N 34.203,6.53 r90 bottom
C68 "22pF" MURATA_HI_DENSITY_0402_CAP -0.099,45.178 r180 bottom value=22uF
C69 "100nF" MURATA_HI_DENSITY_0201 18.992,34.762 r270 top
C70 "22uF" MURATA_HI_DENSITY_0402_CAP 19.982,34.912 r270 top
C71 "100nF" MURATA_HI_DENSITY_0201 11.903,33.992 r0 top
C72 "100nF" MURATA_HI_DENSITY_0201 18.992,29.238 r90 top
C73 "22uF" MURATA_HI_DENSITY_0402_CAP 19.982,29.313 r90 top
C74 "100nF" MURATA_HI_DENSITY_0201 11.903,30.238 r0 top
C75 "100nF" MURATA_HI_DENSITY_0201 18.992,20.515 r270 top
C76 "22uF" MURATA_HI_DENSITY_0402_CAP 19.982,20.665 r270 top
C77 "100nF" MURATA_HI_DENSITY_0201 11.903,19.74 r0 top
C78 "100nF" MURATA_HI_DENSITY_0201 18.992,15.215 r90 top
C79 "22uF" MURATA_HI_DENSITY_0402_CAP 19.982,15.065 r90 top
C80 "100nF" MURATA_HI_DENSITY_0201 11.903,15.99 r0 top
C81 "100nF" MURATA_HI_DENSITY_0201 38.655,36.86 r225 bottom
C82 "100nF" MURATA_HI_DENSITY_0201 37.544,36.86 r315 bottom
C83 "100nF" MURATA_HI_DENSITY_0201 51.752,8.165 r0 top
C84 "100nF" MURATA_HI_DENSITY_0201 51.752,8.665 r0 top
C85 "100nF" MURATA_HI_DENSITY_0201 37.85,51.793 r270 bottom
C86 "100nF" MURATA_HI_DENSITY_0201 37.35,51.793 r270 bottom
C87 "100nF" MURATA_HI_DENSITY_0201 37.85,31.321 r270 bottom
C88 "100nF" MURATA_HI_DENSITY_0201 37.35,31.321 r270 bottom
C89 "100nF" MURATA_HI_DENSITY_0201 68.051,14.709 r180 top
C90 "100nF" MURATA_HI_DENSITY_0201 33.093,-0.247 r90 top
C91 "100nF" MURATA_HI_DENSITY_0201 5.951,6.337 r270 top
C92 "100nF" MURATA_HI_DENSITY_0201 52.584,-3.644 r270 bottom
C93 "100nF" MURATA_HI_DENSITY_0201 51.633,-3.644 r270 bottom
C94 "100nF" MURATA_HI_DENSITY_0201 52.584,0.293 r270 bottom
C95 "100nF" MURATA_HI_DENSITY_0201 51.633,0.293 r270 bottom
C96 "100nF" MURATA_HI_DENSITY_0201 5.401,6.337 r270 top
C97 "100nF" MURATA_HI_DENSITY_0201 24.809,51.623 r90 top
C98 "100nF" MURATA_HI_DENSITY_0201 25.308,51.623 r90 top
C99 "100nF" MURATA_HI_DENSITY_0201 22.782,59.014 r90 top
C100 "100nF" MURATA_HI_DENSITY_0201 22.808,51.623 r270 top
C101 "100nF" MURATA_HI_DENSITY_0201 46.782,59.014 r90 top
C102 "100nF" MURATA_HI_DENSITY_0201 22.232,59.014 r90 top
C103 "100nF" MURATA_HI_DENSITY_0201 22.309,51.623 r270 top
C104 "100nF" MURATA_HI_DENSITY_0201 47.332,59.014 r90 top
C105 "100nF" MURATA_HI_DENSITY_0201 19.727,52.8 r90 top
C106 "100nF" MURATA_HI_DENSITY_0201 29.151,46.78 r0 top
C107 "100nF" MURATA_HI_DENSITY_0201 19.228,52.8 r90 top
C108 "100nF" MURATA_HI_DENSITY_0201 29.151,46.281 r0 top
C109 "100nF" MURATA_HI_DENSITY_0201 29.151,44.78 r0 top
C110 "100nF" MURATA_HI_DENSITY_0201 29.151,44.281 r0 top
C111 "100nF" MURATA_HI_DENSITY_0201 29.151,43.28 r0 top
C112 "100nF" MURATA_HI_DENSITY_0201 29.151,42.781 r0 top
C113 "100nF" MURATA_HI_DENSITY_0201 26.808,40.437 r270 top
C114 "100nF" MURATA_HI_DENSITY_0201 26.309,40.437 r270 top
C115 "1uF" CAPC1005X55N 18.033,42.48 r90 top
C116 "1uF" CAPC1005X55N 27.05,42.58 r270 bottom
C117 "1uF" CAPC1005X55N 27.164,48.269 r90 bottom
C118 "1uF" CAPC1005X55N 21.808,49.48 r90 bottom
C119 "100nF" MURATA_HI_DENSITY_0201 25.308,40.437 r270 top
C120 "100nF" MURATA_HI_DENSITY_0201 24.809,40.437 r270 top
C121 "1uF" CAPC1005X55N 25.683,49.017 r90 bottom
C122 "1uF" CAPC1005X55N 24.308,42.58 r270 bottom
C123 "1uF" CAPC1005X55N 25.808,42.58 r270 bottom
C124 "1uF" CAPC1005X55N 26.99,49.61 r0 bottom
C125 "1uF" CAPC1005X55N 23.308,49.48 r90 bottom
C126 "1uF" CAPC1005X55N 27.005,44.05 r0 bottom
C127 "1uF" CAPC1005X55N 27.008,45.78 r0 bottom
C128 "1uF" CAPC1005X55N 27.917,42.58 r270 bottom
C129 "10uF" CAPC1608X87N 28.983,52.325 r180 top
C130 "10uF" CAPC1608X87N 36.338,34.511 r90 top
C131 "22uF" MURATA_HI_DENSITY_0402_CAP 36.233,11.321 r0 bottom
C132 "470nF" CAPC0510X04N 37.491,11.304 r180 bottom
C133 "33nF" LLL03TR61E333KE01 36.079,11.568 r270 top
C134 "470nF" CAPC0510X04N 47.37,11.596 r90 bottom
C135 "33nF" LLL03TR61E333KE01 47.674,11.994 r180 top
C136 "470nF" CAPC0510X04N 47.011,5.935 r90 top
C137 "33nF" LLL03TR61E333KE01 47.664,6.728 r180 top
C138 "470nF" CAPC0510X04N 46.511,9.889 r270 bottom
C139 "33nF" LLL03TR61E333KE01 47.181,9.029 r180 bottom
C140 "100nF" MURATA_HI_DENSITY_0201 45.854,8.165 r180 top
C141 "100nF" MURATA_HI_DENSITY_0201 45.854,8.665 r180 top
C142 "100nF" MURATA_HI_DENSITY_0201 43.986,-1.447 r180 top
C143 "470nF" CAPC0510X04N 50.271,11.553 r180 bottom
C144 "33nF" LLL03TR61E333KE01 50.243,12.099 r180 top
C145 "100nF" MURATA_HI_DENSITY_0201 45.135,5.666 r90 bottom
C146 "100nF" MURATA_HI_DENSITY_0201 52.584,4.132 r270 bottom
C147 "100nF" MURATA_HI_DENSITY_0201 51.633,4.132 r270 bottom
C148 "100nF" MURATA_HI_DENSITY_0201 44.473,3.787 r270 top
C149 "100nF" MURATA_HI_DENSITY_0201 42.835,2.88 r270 top
C150 "100nF" MURATA_HI_DENSITY_0201 41.65,2.312 r180 top
C151 "100nF" MURATA_HI_DENSITY_0201 35.616,9.936 r90 bottom
D1 "APHHS1005LZGCK-V" LED_APHHS1005LZGCK-V 4.753,47.956 r180 top
D2 "APHHS1005LZGCK-V" LED_APHHS1005LZGCK-V 11.785,54.418 r180 top
D3 "APHHS1005LZGCK-V" LED_APHHS1005LZGCK-V 7.744,39.77 r270 top
D4 "APHHS1005LZGCK-V" LED_APHHS1005LZGCK-V 37.229,-0.087 r0 top
D5 "APTD1608LVBC_D" LEDC1608X110N 16.821,39.078 r90 top
FTG1 "Use only in PCB" FIDUCIAL_TOP_C100-200 67.172,60.499 r180 top
FTG2 "Use only in PCB" FIDUCIAL_TOP_C100-200 68.113,-2.499 r0 bottom
FTG3 "Use only in PCB" FIDUCIAL_TOP_C100-200 -3.96,56.551 r0 bottom
FTG4 "Use only in PCB" FIDUCIAL_TOP_C100-200 -3.96,0 r180 top
IC1_l0 "NB7V52MMNG" QFN50P300X300X100-17N 52.949,46.759 r0 top (schematic designator IC1)
IC1_l1 "NB7V52MMNG" QFN50P300X300X100-17N 52.949,16.05 r0 top (schematic designator IC1)
IC1_l2 "NB7V52MMNG" QFN50P300X300X100-17N 52.949,26.286 r0 top (schematic designator IC1)
IC1_l3 "NB7V52MMNG" QFN50P300X300X100-17N 52.949,36.523 r0 top (schematic designator IC1)
IC2_l0 "NB7VQ14MMNHTBG" QFN50P300X300X100-17N 38.1,49.351 r90 bottom (schematic designator IC2)
IC2_l1 "NB7VQ14MMNHTBG" QFN50P300X300X100-17N 38.1,18.641 r90 bottom (schematic designator IC2)
IC2_l2 "NB7VQ14MMNHTBG" QFN50P300X300X100-17N 38.1,28.878 r90 bottom (schematic designator IC2)
IC2_l3 "NB7VQ14MMNHTBG" QFN50P300X300X100-17N 38.1,39.114 r90 bottom (schematic designator IC2)
IC3_l0 "74AUP1G32GS,132" 74LVC1G3157GS132 39.49,43.726 r90 top (schematic designator IC3)
IC3_l1 "74AUP1G32GS,132" 74LVC1G3157GS132 42.99,10.512 r90 top (schematic designator IC3)
IC3_l2 "74AUP1G32GS,132" 74LVC1G3157GS132 39.49,23.253 r90 top (schematic designator IC3)
IC3_l3 "74AUP1G32GS,132" 74LVC1G3157GS132 39.49,33.49 r90 top (schematic designator IC3)
IC4 "ADP7159ACPZ-04-R7" SON50P300X300X85-11N-D -0.732,50.987 r180 top
IC5 "ADP7159ACPZ-04-R7" SON50P300X300X85-11N-D 6.301,57.449 r180 top
IC6 "ADP7159ACPZ-04-R7" SON50P300X300X85-11N-D 2.434,44.43 r180 top
IC7 "LT3045EDD" SON50P300X300X80-11N-R175X248 36.438,4.134 r90 bottom
IC8 "32207590" PT100 3.566,0.12 r90 top
IC9 "M24C02-RMN6TP" SOIC127P600X175-8N 62.791,12.613 r0 top
IC10 "TCA9548ADGSR" SOP50P490X110-24N 29.766,2.027 r0 top
IC11 "SI5345B-D-GM" QFN50P900X900X90-65N-D 23.558,46.03 r0 top
IC12 "SN65LVDS4RSER" SN65LVDS4RSER 43.775,0.058 r180 top
ICx1 "DCPS3" DCPS3-Large 37.569,11.169 r90 top
J1 "2007263-1_NP" 20072631_NP 8.521,25.19 r90 bottom
J2 "SFP+" TYCO_1888247-1 26.271,32.31 r0 bottom
J3 "SFP+" TYCO_1888247-1 26.271,18.06 r0 bottom
J4 "SEAM-40-03.5-S-10-2-A-K-TR" SAMTEC_SEAM-40-03.5-S-10-2-A-K-TR 65.203,29.025 r90 bottom
J5 "SMA" SAMTEC_SMA-J-P-H-ST-MT1 11.814,6.062 r0 top
J6 "SMA" SAMTEC_SMA-J-P-H-ST-MT1 -0.461,6.062 r0 top
J7 "SMA" SAMTEC_SMA-J-P-H-ST-MT1 28.645,59.289 r0 top
J8 "SMA" SAMTEC_SMA-J-P-H-ST-MT1 40.92,59.289 r0 top
J9 "SMA" SAMTEC_SMA-J-P-H-ST-MT1 16.37,59.289 r0 top
J10 "SMA" SAMTEC_SMA-J-P-H-ST-MT1 53.195,59.289 r0 top
L1 "4.7uH" DFE322520FD1R0MP2 23.394,2.319 r90 top
L2 "4.7uH" DFE322520FD1R0MP2 15.536,33.992 r180 top
L3 "4.7uH" DFE322520FD1R0MP2 15.536,30.238 r180 top
L4 "4.7uH" DFE322520FD1R0MP2 15.536,19.74 r180 top
L5 "4.7uH" DFE322520FD1R0MP2 15.536,15.992 r180 top
LED1_l0 "APTD1608LSECKJ3-PF" LED_APTD1608LSECKJ3-PF_KNB 38.003,44.857 r90 top (schematic designator LED1)
LED1_l1 "APTD1608LSECKJ3-PF" LED_APTD1608LSECKJ3-PF_KNB 41.5,11.64 r90 top (schematic designator LED1)
LED1_l2 "APTD1608LSECKJ3-PF" LED_APTD1608LSECKJ3-PF_KNB 38,24.381 r90 top (schematic designator LED1)
LED1_l3 "APTD1608LSECKJ3-PF" LED_APTD1608LSECKJ3-PF_KNB 38.003,34.617 r90 top (schematic designator LED1)
LED2 "APTD1608LSECKJ3-PF" LED_APTD1608LSECKJ3-PF_KNB 6.74,32.115 r90 top
LED3 "APTD1608LSECKJ3-PF" LED_APTD1608LSECKJ3-PF_KNB 2.467,32.115 r90 top
LED4 "APTD1608LSECKJ3-PF" LED_APTD1608LSECKJ3-PF_KNB 6.74,17.865 r90 top
LED5 "APTD1608LSECKJ3-PF" LED_APTD1608LSECKJ3-PF_KNB 2.467,17.865 r90 top
Q1 "CSD15380F3" CSD15380F3 -0.438,49.604 r90 bottom
Q2 "CSD15380F3" CSD15380F3 7.544,41.294 r0 top
Q3 "CSD15380F3" CSD15380F3 4.531,58.723 r180 bottom
Q4 "CSD15380F3" CSD15380F3 36.251,0.686 r0 top
Q5 "CSD15380F3" CSD15380F3 1.554,44.364 r180 bottom
Q6 "CSD15380F3" CSD15380F3 6.74,30.347 r90 top
Q7 "CSD15380F3" CSD15380F3 2.467,30.347 r90 top
Q8 "CSD15380F3" CSD15380F3 6.74,16.097 r90 top
Q9 "CSD15380F3" CSD15380F3 2.467,16.097 r90 top
Q10 "48MHz" XTAL_KYOCERA_CX3225SB 14.996,46.03 r270 top
Q11 "CSD15380F3" CSD15380F3 16.821,37.281 r90 top
Q12 "CSD15380F3" CSD15380F3 45.143,3.771 r0 top
R1_l0 "100Ω" MURATA_HI_DENSITY_0201 49.327,47.241 r90 top (schematic designator R1)
R1_l1 "100Ω" MURATA_HI_DENSITY_0201 49.327,16.532 r90 top (schematic designator R1)
R1_l2 "100Ω" MURATA_HI_DENSITY_0201 49.327,26.769 r90 top (schematic designator R1)
R1_l3 "100Ω" MURATA_HI_DENSITY_0201 49.327,37.005 r90 top (schematic designator R1)
R2_l0 "100Ω" MURATA_HI_DENSITY_0201 49.327,46.277 r270 top (schematic designator R2)
R2_l1 "100Ω" MURATA_HI_DENSITY_0201 49.327,15.568 r270 top (schematic designator R2)
R2_l2 "100Ω" MURATA_HI_DENSITY_0201 49.327,25.804 r270 top (schematic designator R2)
R2_l3 "100Ω" MURATA_HI_DENSITY_0201 49.327,36.041 r270 top (schematic designator R2)
R3_l0 "10k" MURATA_HI_DENSITY_0201 49.756,50.424 r0 top value=100Ω (schematic designator R3)
R3_l1 "10k" MURATA_HI_DENSITY_0201 49.756,19.715 r0 top value=100Ω (schematic designator R3)
R3_l2 "10k" MURATA_HI_DENSITY_0201 49.756,29.951 r0 top value=100Ω (schematic designator R3)
R3_l3 "10k" MURATA_HI_DENSITY_0201 49.756,40.188 r0 top value=100Ω (schematic designator R3)
R4_l0 "10k" MURATA_HI_DENSITY_0201 49.756,51.013 r0 top value=100Ω (schematic designator R4)
R4_l1 "10k" MURATA_HI_DENSITY_0201 49.756,20.304 r0 top value=100Ω (schematic designator R4)
R4_l2 "10k" MURATA_HI_DENSITY_0201 49.756,30.54 r0 top value=100Ω (schematic designator R4)
R4_l3 "10k" MURATA_HI_DENSITY_0201 49.756,40.776 r0 top value=100Ω (schematic designator R4)
R5_l0 "100Ω" MURATA_HI_DENSITY_0201 42.687,50.841 r0 top (schematic designator R5)
R5_l1 "100Ω" MURATA_HI_DENSITY_0201 42.699,20.12 r0 top (schematic designator R5)
R5_l2 "100Ω" MURATA_HI_DENSITY_0201 42.687,30.369 r0 top (schematic designator R5)
R5_l3 "100Ω" MURATA_HI_DENSITY_0201 42.687,40.605 r0 top (schematic designator R5)
R6_l0 "1k5" RESC1005X40N 39.143,45.21 r270 top (schematic designator R6)
R6_l1 "1k5" RESC1005X40N 42.64,11.996 r270 top (schematic designator R6)
R6_l2 "1k5" RESC1005X40N 39.14,24.737 r270 top (schematic designator R6)
R6_l3 "1k5" RESC1005X40N 39.143,34.973 r270 top (schematic designator R6)
R7 "1M" MURATA_HI_DENSITY_0201 -1.198,51.236 r90 bottom value=100Ω
R8 "100Ω" MURATA_HI_DENSITY_0201 -0.438,50.576 r90 bottom
R9 "750" RESC1005X40N 3.382,48.426 r90 top
R10 "1M" MURATA_HI_DENSITY_0201 -0.263,48.343 r90 bottom value=100Ω
R11 "47k" RESC1005X40N -3.131,52.711 r270 top
R12 "27k" RESC1005X40N -4.311,53.18 r0 top
R13 "100k" RESC1608X55N 17.421,0.736 r90 top value=30k
R14 "750" RESC1005X40N 10.415,54.888 r90 top
R15 "150k" RESC1608X55N 18.122,-3.326 r180 top
R16 "30k" RESC1608X55N 18.122,-1.825 r180 top
R17 "47k" RESC1005X40N 3.899,59.175 r270 top
R18 "27k" RESC1005X40N 2.729,59.642 r0 top
R19 "100k" RESC1608X55N 13.081,23.622 r0 top value=30k
R20 "243k" RESC1608X55N 2.056,22.542 r90 top value=30k
R21 "750" RESC1005X40N 8.724,38.839 r270 top
R22 "100k" RESC1608X55N 3.497,22.542 r90 top value=30k
R23 "10k" MURATA_HI_DENSITY_0201 0.09,46.154 r270 top value=100Ω
R24 "200k" RESC1005X40N 6.548,41.869 r270 top
R25 "5k1" RESC1005X40N 54.288,49.712 r0 top
R26 "20k" RESC1005X40N -1.101,46.589 r0 top
R27 "10k" MURATA_HI_DENSITY_0201 52.553,49.712 r0 top value=100Ω
R28 "1M" MURATA_HI_DENSITY_0201 2.899,57.963 r180 bottom value=100Ω
R29 "100Ω" MURATA_HI_DENSITY_0201 3.449,58.723 r180 bottom
R30 "300" RESC1005X40N 34.392,3.104 r270 bottom
R31 "750" RESC1005X40N 39.078,-0.082 r0 top
R32 "1M" MURATA_HI_DENSITY_0201 5.517,58.677 r90 bottom value=100Ω
R33 "200k" RESC1005X40N 35.367,0.382 r270 top
R34 "750k" RESC1005X40N 38.331,7.321 r270 bottom
R35 "10k" RESC0603X28N 35.948,7.336 r180 bottom value=0
R36 "1M" MURATA_HI_DENSITY_0201 0.197,43.329 r270 bottom value=100Ω
R37 "100Ω" MURATA_HI_DENSITY_0201 0.582,44.364 r180 bottom
R38 "200k" RESC1005X40N 39.534,8.261 r270 bottom
R39 "243k" RESC1608X55N 37.531,8.907 r0 bottom value=30k
R40 "1M" MURATA_HI_DENSITY_0201 4.171,42.519 r180 bottom value=100Ω
R41 "1k5" RESC1005X40N 7.21,33.819 r0 top
R42 "1k5" RESC1005X40N 2.937,33.819 r0 top
R43 "10k" MURATA_HI_DENSITY_0201 21.629,28.818 r180 top value=100Ω
R44 "10k" MURATA_HI_DENSITY_0201 21.629,29.738 r180 top value=100Ω
R45 "10k" MURATA_HI_DENSITY_0201 21.629,35.535 r180 top value=100Ω
R46 "200k" RESC1005X40N 7.035,29.287 r180 top
R47 "200k" RESC1005X40N 2.762,29.287 r180 top
R48 "10k" MURATA_HI_DENSITY_0201 21.629,34.487 r180 top value=100Ω
R49 "1k5" RESC1005X40N 7.21,19.569 r0 top
R50 "1k5" RESC1005X40N 2.937,19.569 r0 top
R51 "10k" MURATA_HI_DENSITY_0201 21.629,14.568 r180 top value=100Ω
R52 "10k" MURATA_HI_DENSITY_0201 21.652,15.488 r180 top value=100Ω
R53 "10k" MURATA_HI_DENSITY_0201 21.629,21.285 r180 top value=100Ω
R54 "200k" RESC1005X40N 7.035,15.037 r180 top
R55 "200k" RESC1005X40N 2.762,15.037 r180 top
R56 "10k" MURATA_HI_DENSITY_0201 21.629,20.237 r180 top value=100Ω
R57 "10k" MURATA_HI_DENSITY_0201 66.552,14.907 r270 top value=100Ω
R58 "10k" MURATA_HI_DENSITY_0201 68.122,13.565 r180 top value=100Ω
R59 "10k" MURATA_HI_DENSITY_0201 63.97,9.332 r180 top value=100Ω
R60 "10k" MURATA_HI_DENSITY_0201 31.703,1.611 r0 bottom value=100Ω
R61 "10k" MURATA_HI_DENSITY_0201 31.703,2.29 r0 bottom value=100Ω
R62 "10k" MURATA_HI_DENSITY_0201 35.507,-1.319 r270 bottom value=100Ω
R63 "10k" MURATA_HI_DENSITY_0201 34.872,-1.319 r270 bottom value=100Ω
R64 "10k" MURATA_HI_DENSITY_0201 49.055,0.372 r0 top value=100Ω
R65 "100Ω" MURATA_HI_DENSITY_0201 18.269,49.53 r90 top
R66 "100Ω" MURATA_HI_DENSITY_0201 21.058,52.277 r180 top
R67 "100Ω" MURATA_HI_DENSITY_0201 20.058,51.212 r0 top
R68 "10k" MURATA_HI_DENSITY_0201 13.768,40.543 r90 top value=100Ω
R69 "10k" MURATA_HI_DENSITY_0201 13.767,39.023 r270 top value=100Ω
R70 "22" RESC1005X40N 12.665,40.683 r270 top
R71 "22" RESC1005X40N 12.665,38.883 r90 top
R72 "750" RESC1005X40N 16.799,41.312 r90 top
R73 "200k" RESC1005X40N 15.86,37.551 r270 top
R74 "200k" RESC1005X40N 40.082,4.535 r0 top
R75 "100Ω" MURATA_HI_DENSITY_0201 45.087,0.062 r270 top
R76 "10k" MURATA_HI_DENSITY_0201 48.492,12.106 r270 top value=100Ω
R77 "1k5" RESC1005X40N 46.587,3.772 r0 top
R78 "1M" MURATA_HI_DENSITY_0201 42.882,6.2 r270 top value=100Ω
R79 "1M" MURATA_HI_DENSITY_0201 43.597,3.49 r180 top value=100Ω
R80 "200k" RESC1005X40N 41.375,0.494 r270 top
R81 "10k" MURATA_HI_DENSITY_0201 41.661,5.011 r270 top value=100Ω
R82 "10k" MURATA_HI_DENSITY_0201 42.209,5.011 r270 top value=100Ω
R83 "10k" MURATA_HI_DENSITY_0201 43.428,1.707 r180 bottom value=100Ω
R84 "10k" MURATA_HI_DENSITY_0201 43.428,2.232 r180 bottom value=100Ω
RN1 "EXB-U18103JX" EXBU18 27.347,0.777 r270 bottom
RN2 "EXB-U18103JX" EXBU18 32.005,0.027 r90 bottom
RN3 "EXB-U18103JX" EXBU18 27.343,2.649 r90 bottom
TP1_l0 "RCU-0C" TP+195X110 40.031,42.023 r180 top (schematic designator TP1)
TP1_l1 "RCU-0C" TP+195X110 39.744,17.575 r90 top (schematic designator TP1)
TP1_l2 "RCU-0C" TP+195X110 40.028,21.55 r180 top (schematic designator TP1)
TP1_l3 "RCU-0C" TP+195X110 40.028,31.786 r180 top (schematic designator TP1)
TP2 "RCU-0C" TP+195X110 3.138,50.899 r90 top
TP3 "RCU-0C" TP+195X110 -4.349,25.19 r90 top
TP4 "RCU-0C" TP+195X110 34.776,59.64 r180 top
TP5 "RCU-0C" TP+195X110 3.24,27.547 r180 top
TP6 "RCU-0C" TP+195X110 17.696,25.19 r180 top
TP7 "RCU-0C" TP+195X110 40.077,6.022 r180 top
TP8 "RCU-0C" TP+195X110 68.378,8.07 r180 top
TP9 "RCU-0C" TP+195X110 68.378,5.53 r0 top
TP10 "RCU-0C" TP+195X110 64.85,6.794 r180 top
TP11 "RCU-0C" TP+195X110 14.073,37.285 r180 top
TP12 "RCU-0C" TP+195X110 56.186,6.881 r0 top
TP13 "RCU-0C" TP+195X110 30.155,11.468 r0 top
TP14 "RCU-0C" TP+195X110 56.186,4.329 r0 top
TP15 "RCU-0C" TP+195X110 30.155,14.02 r0 top
TP16 "RCU-0C" TP+195X110 56.186,1.777 r180 top
TP17 "RCU-0C" TP+195X110 30.155,16.572 r180 top
TP18 "RCU-0C" TP+195X110 56.186,-0.776 r0 top
TP19 "RCU-0C" TP+195X110 30.155,19.124 r180 top
U1_l0 "ADN2817ACPZ-RL7" CP_32_11_ADI 45.803,48.259 r270 top (schematic designator U1)
U1_l1 "ADN2817ACPZ-RL7" CP_32_11_ADI 45.803,17.55 r270 top (schematic designator U1)
U1_l2 "ADN2817ACPZ-RL7" CP_32_11_ADI 45.803,27.786 r270 top (schematic designator U1)